# Altium PCB Tony_Tablet.PcbDoc (part 1 of 5)
Units mm, origin at the board's own origin, x right, y up, seen from the top; angles counter-clockwise.
Board outline 136.83 x 90.55 mm, 4 copper layers (Top Layer, Power, GND, Bottom Layer), stack 0.778 mm thick; 275 components, 264 nets, 1226 pads, 0 vias.
Unrouted connection lines stored in the file: 716.
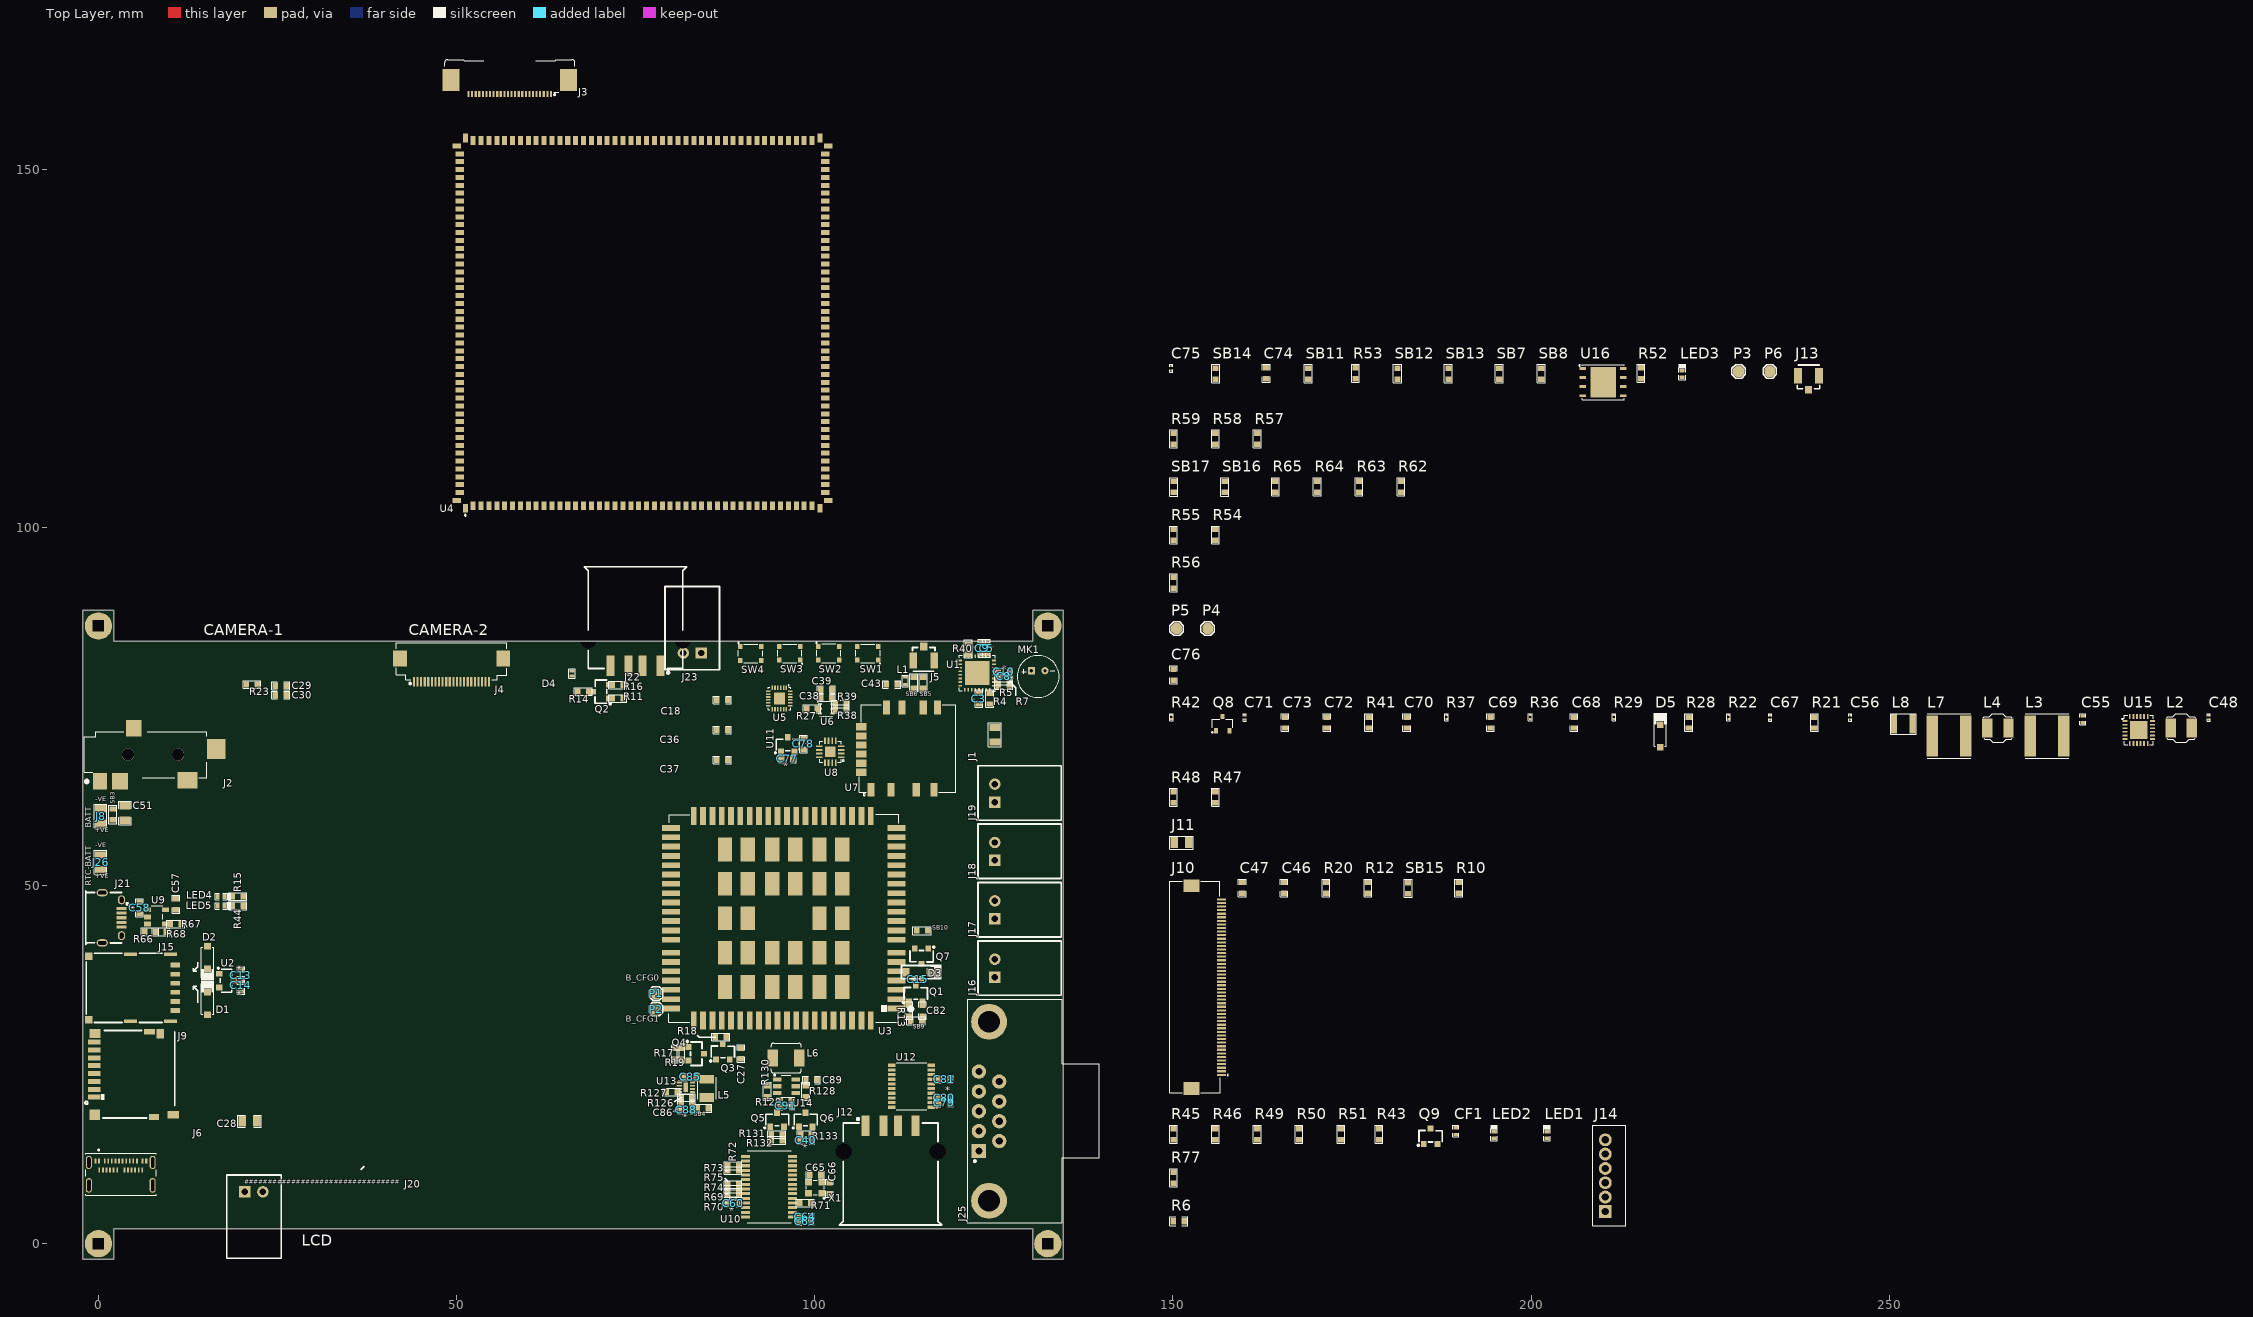
[diagram p0: Top Layer view]
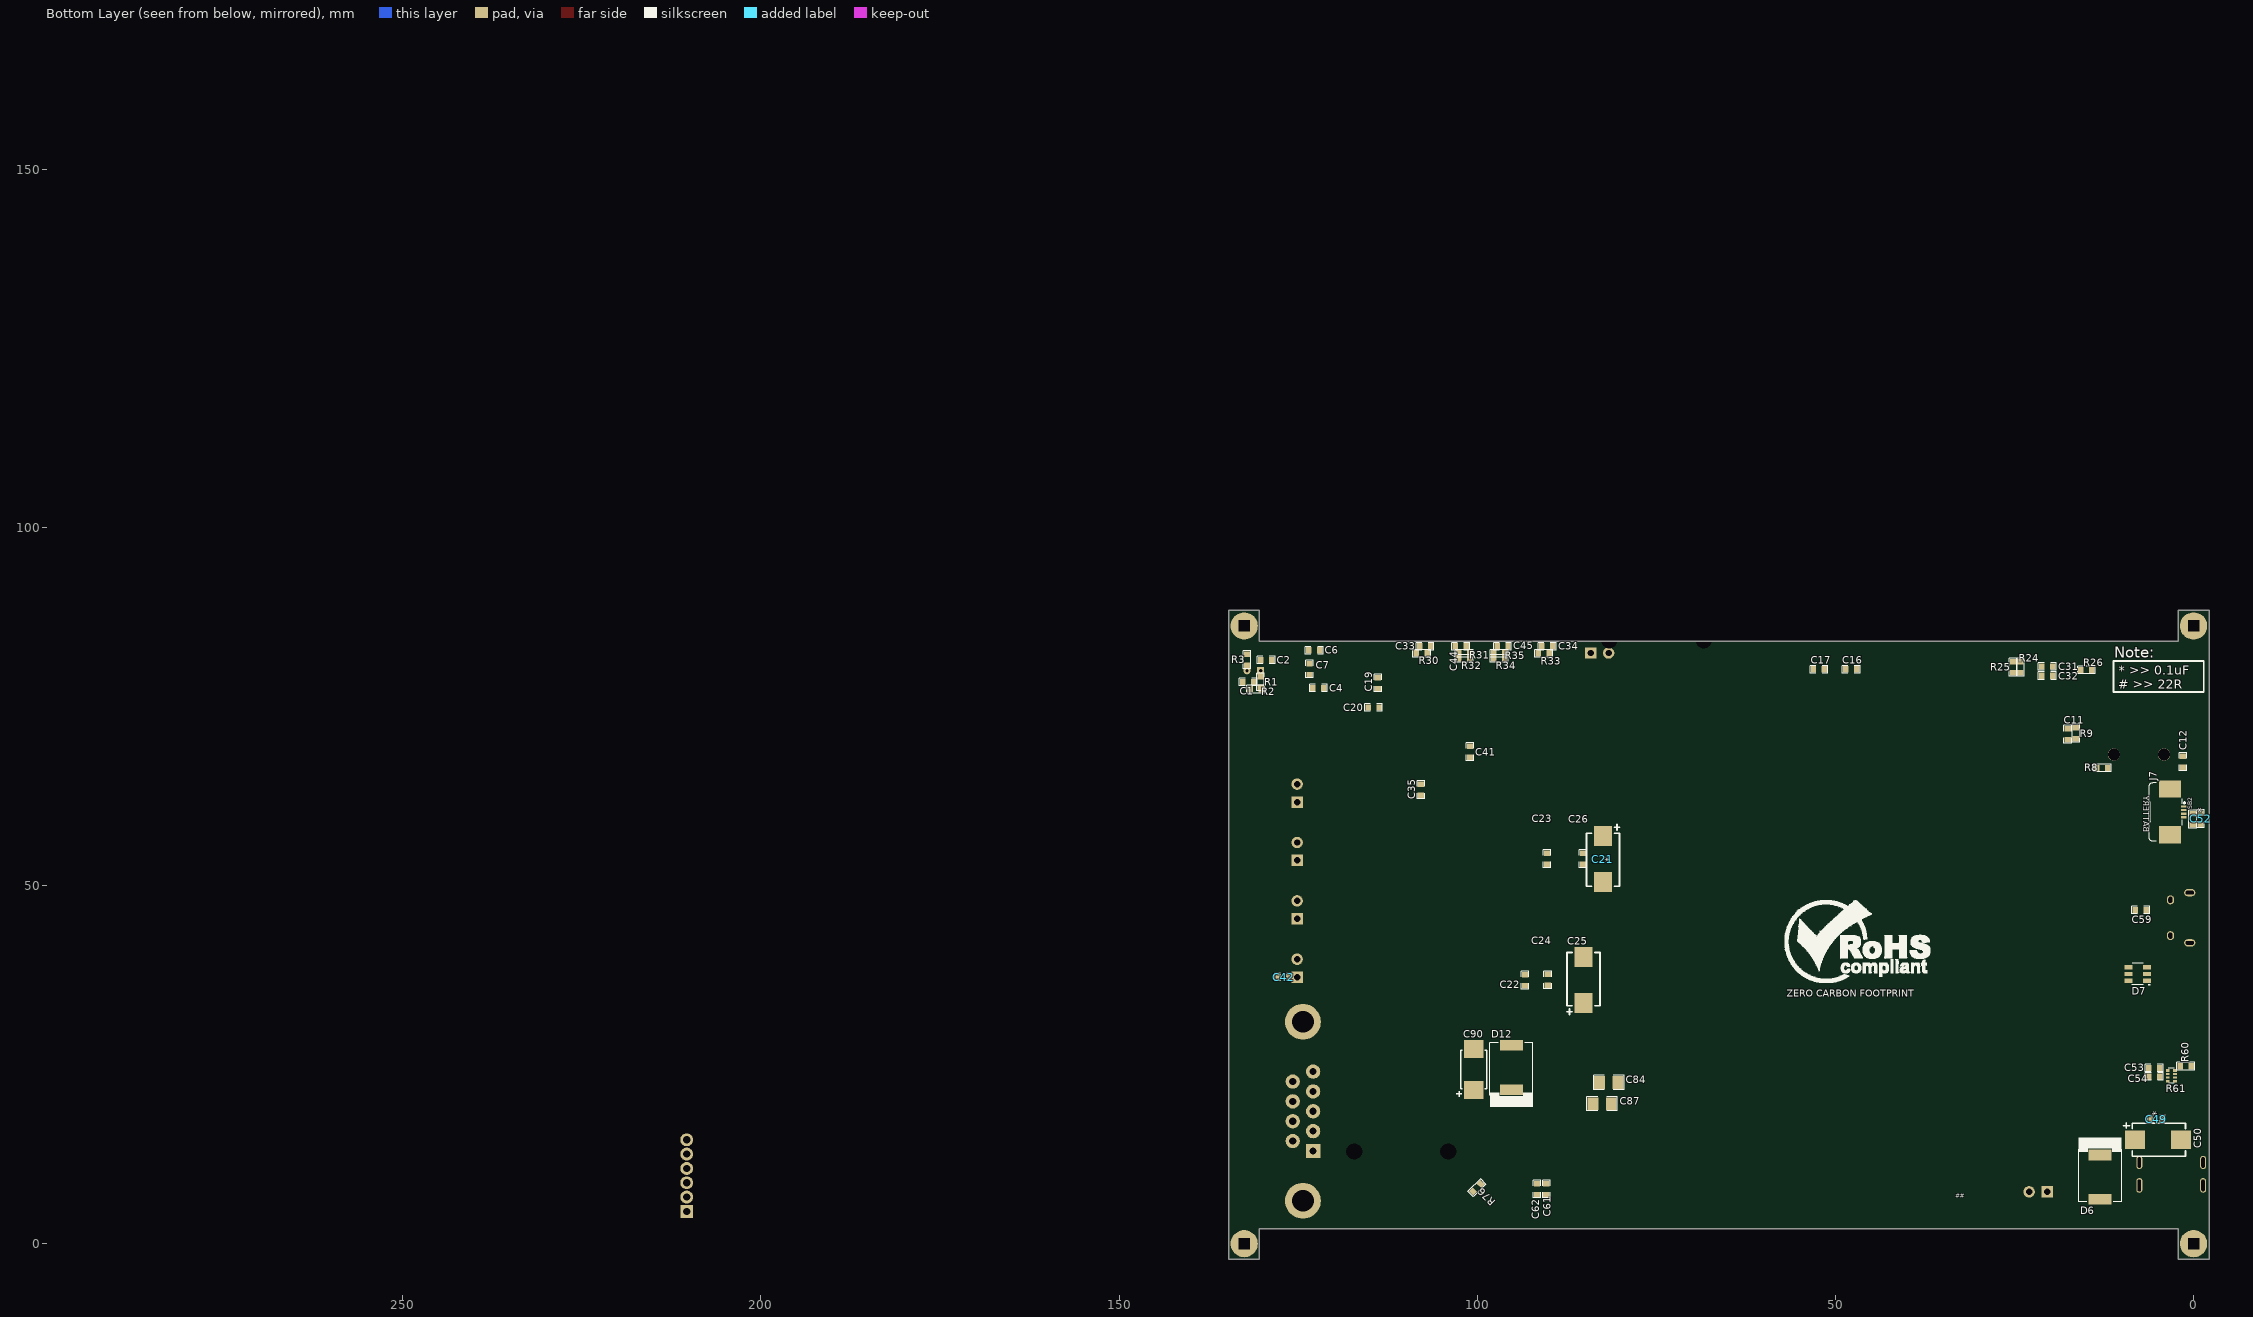
[diagram p1: Bottom Layer view, seen from below]
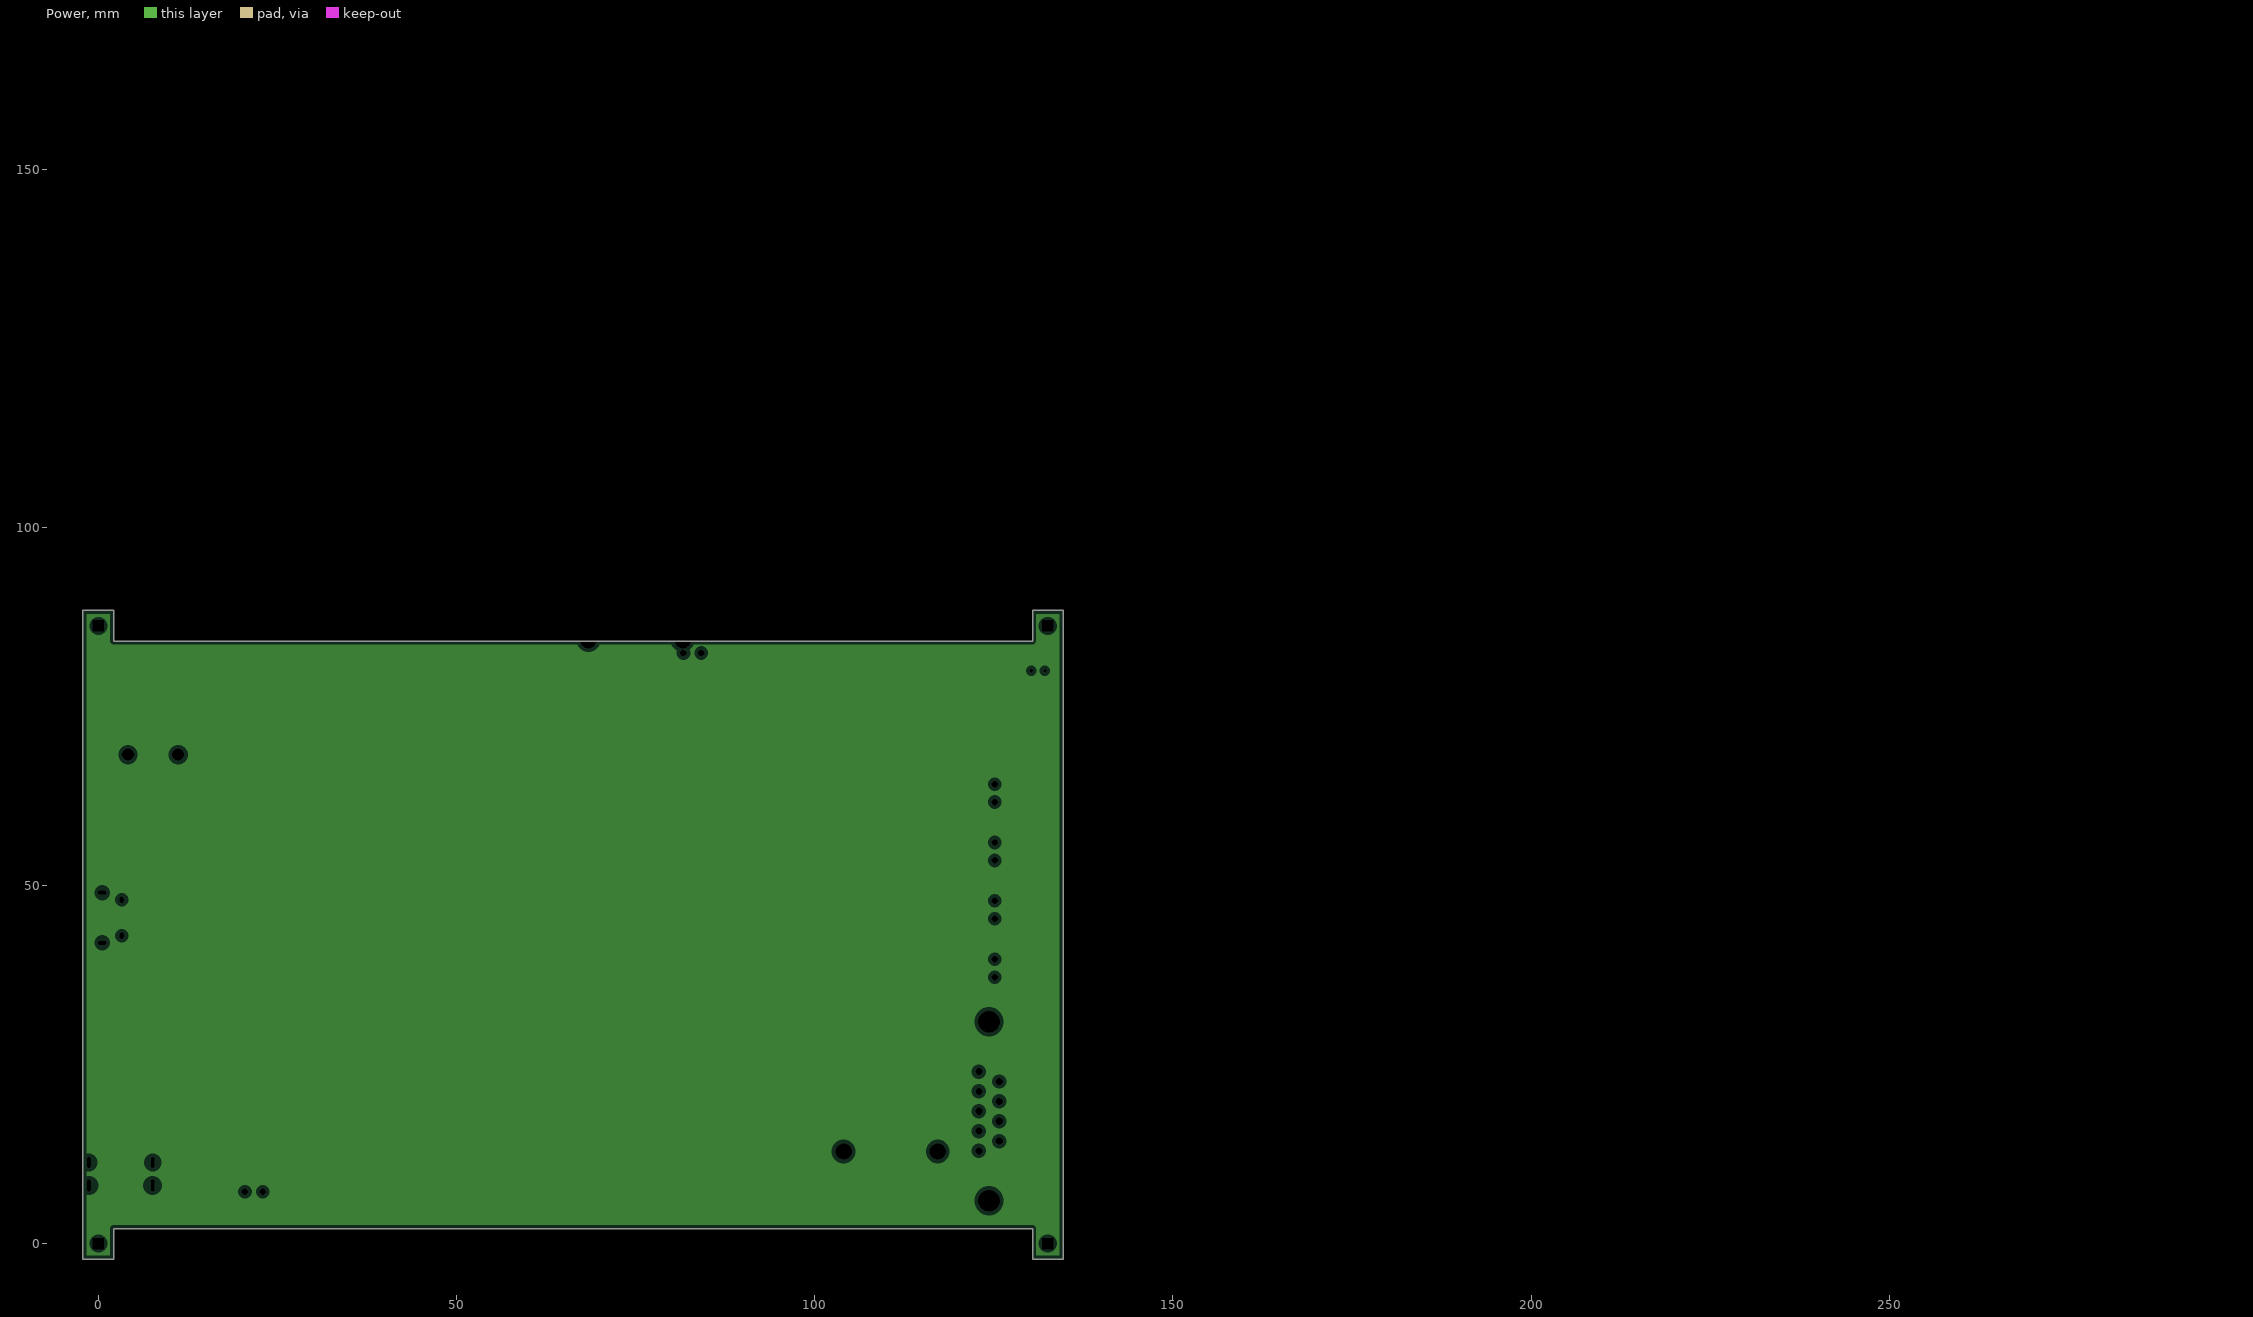
[diagram p2: Power, clearances drawn from the general rule]
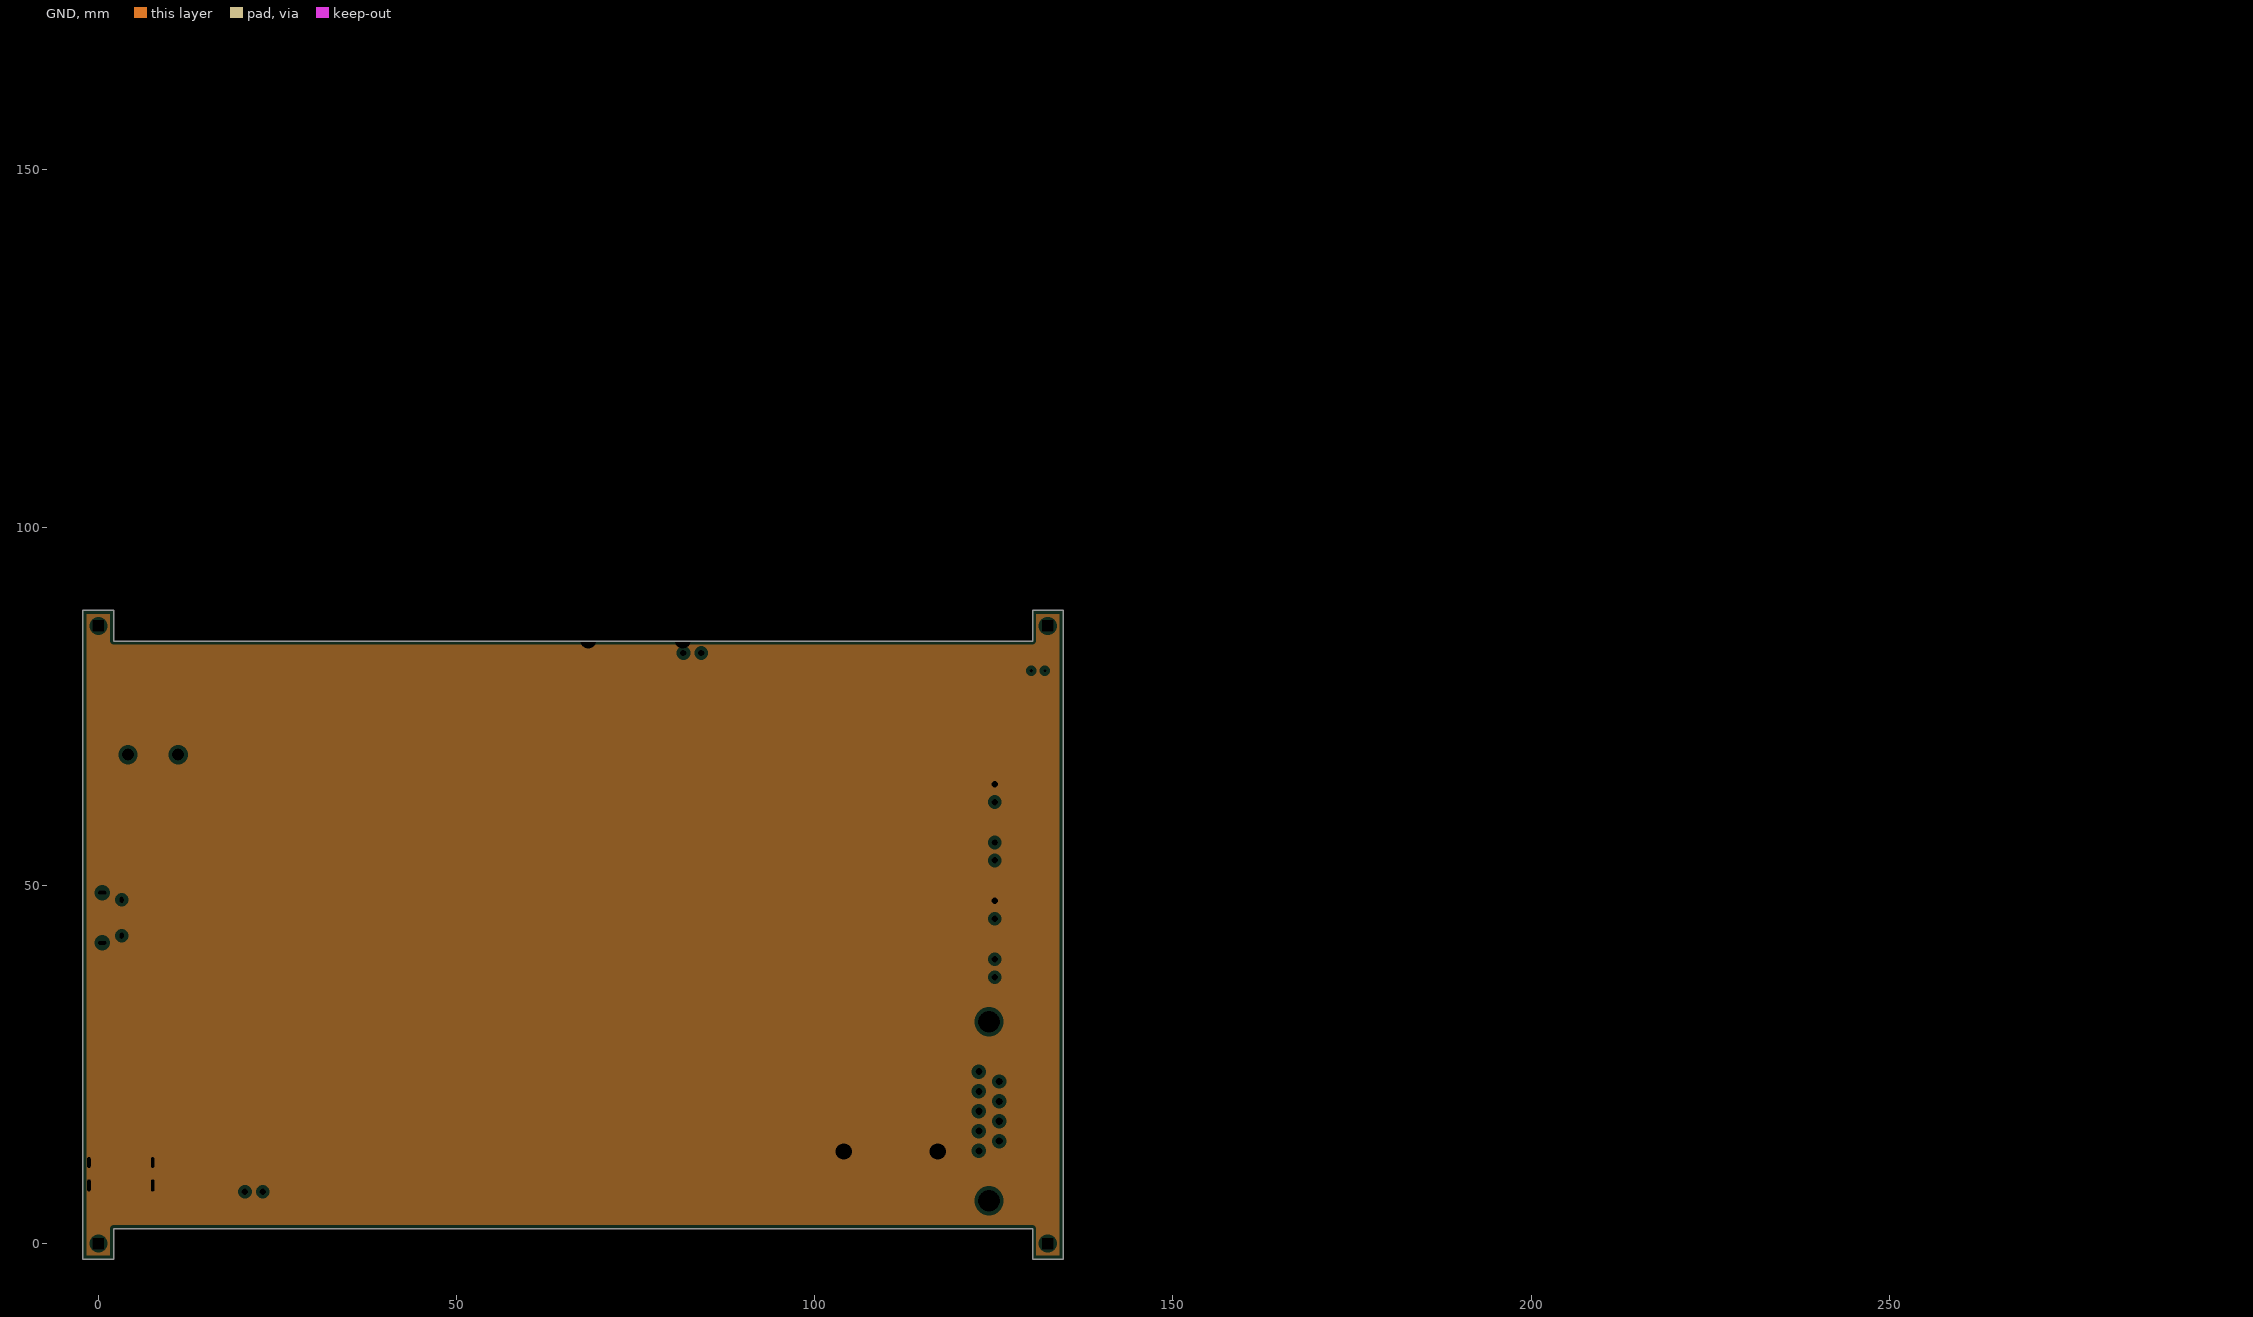
[diagram p3: GND, clearances drawn from the general rule]

## Layer stack, top to bottom
Top Solder: solder mask 0.0102, Solder Resist, Dk 3.5
Top Layer: signal copper 0.0356
Dielectric 1: core 0.254, FR-4, Dk 4.2
Power: plane copper 0.036
Dielectric 2: prepreg 0.127, Dk 4.2
GND: plane copper 0.036, net GND
Dielectric 3: core 0.254, Dk 4.2
Bottom Layer: signal copper 0.0356
Bottom Solder: solder mask 0.0102, Solder Resist, Dk 3.5

## Board outline
-2.159,-2.159 -2.159,-2.134 -2.159,88.392 2.134,88.392 2.134,84.125 130.404,84.125 130.404,88.392 134.671,88.392 134.671,-2.159 130.404,-2.159 130.404,2.108 2.134,2.108 2.134,-2.159

## Design rules (kind name [scope] priority, off if disabled: settings)
Clearance [All] p1: gap=0.178 ignorepadtopadclearanceinfootprint=FALSE except(0.127: Arc-SMDPad Track-SMDPad SMDPad-SMDPad)
ComponentClearance [All] p1: gap=0 collisioncheckmode=3 verticalgap=0 showdistances=FALSE
Height [All] p1: minheight=0 maxheight=254 prefheight=12.7
HoleSize [All] p1: absolutevalues=TRUE maxlimit=25.4 minlimit=0.025 maxpercent=80.000 minpercent=20.000
HoleToHoleClearance [All] p1: gap=0.025 allowstackedmicrovias=TRUE
MinimumSolderMaskSliver [All] p1: minsoldermaskwidth=0.025
PlaneClearance [All] p1: clearance=0.508
PlaneConnect [All] p1: planeconnectstyle=Direct reliefexpansion=0.508 reliefentries=4 reliefconductorwidth=0.254 reliefairgap=0.254
PolygonConnect [All] p1: connectstyle=Relief reliefconductorwidth=0.254 reliefentries=4 polygonreliefangle="90 Angle" airgapwidth=0.254
RoutingVias [All] p1: holewidth=0.711 width=1.27 viastyle="Through Hole" minholewidth=0.711 minwidth=1.27 maxholewidth=0.711 maxwidth=1.27
SilkToSilkClearance [All] p1: silktosilkclearance=0.025
SilkToSolderMaskClearance [IsPad] p1: minsilkscreentomaskgap=0.025 clearancetoexposedcopper=TRUE
SolderMaskExpansion SolderMaskExpansion_1 [IsVia] p1: expansion=0.102 soldermaskfromhole=TRUE
SolderMaskExpansion [Not IsVia] p2: expansion=0.102
Width [All] p1: maxlimit=2.54 minlimit=0.203 preferedwidth=0.305
21 further rules are at their usual default settings.

## Classes and differential pairs
component class U_LCD_Drive_Sec: C48 C55 C56 C67 C68 C69 C70 C71 C72 C73 D5 L2 L3 L4 L7 L8 Q8 R21 R22 R28 R29 R36 R37 R41 R42 U15
component class U_USIM_Sec: C14 C21 C22 C23 C24 C25 C26 C27 C74 C75 D3 D4 D7 J13 J15 J23 LED3 P1 P2 P3 P6 R44 R52 R53 SB7 SB8 SB9 SB10 SB11 SB12 SB13 SB14 U3 U16
component class U_USB_Power: C40 C89 C90 C91 D12 L6 Q5 Q6 R128 R129 R130 R131 R132 R133 U14
component class U_USB_OTG: C57 C58 C59 J21 R57 R58 R59 U9
component class U_USB_Host: C60 C61 C62 C63 C64 C65 C82 J12 J22 R60 R62 R63 R64 R65 R66 R67 R70 SB16 SB17 U10 X1
component class U_Sensor_Section: C18 C36 C37 C38 C39 R27 R38 R39 U5 U6
component class U_RTC_Sec: C13 C66 D1 D2 J26 U2
component class "U_RS-232 Tranceiver Section": C52 C78 C79 C80 C81 J16 J17 J18 J19 J25 R54 R55 U12
component class U_MIC_Sec: C1 C2 MK1 R1 R2 R3
component class U_Memory_Section: C53 C54 J9 R56 R61
component class U_MCU_Core_Power: C84 C85 C86 C87 C88 L5 R126 R127 SB4 U13
component class U_Main_Cont: C28 J20 LED4 P4 P5 R11 U4
component class U_Main_Cont_2: LED5 R77
component class U_Level_Shifter_Sec: C41 C76 U11
component class U_7''_LCD_Connector: C46 C47 J10 R10 R12 R20 R68 R69 R71 R72 R73 R74 R75 R76 SB15
component class U_Key_Buttons: C33 C34 C44 C45 R30 R31 R32 R33 R34 R35 SW1 SW2 SW3 SW4
component class U_Headphones_Sec: C11 C12 J2 R8 R9
component class U_Connector_Section: C42 C49 C50 C51 D6 J6 J7 J8 R47 R48 SB2 SB3
component class U_Camera_Section: C16 C17 C29 C30 C31 C32 J3 J4 R23 R26 R27
component class U_BLE&WiFi_Section: C19 C20 C35 C43 C77 J5 L1 SB5 SB6 U7 U8
component class U_Audio_Codec_Sec: C3 C4 C5 C6 C7 C8 C9 C10 J1 J11 R4 R5 R7 R40 U1
component class U_3G_Modem: C15 C82 CF1 J14 LED1 LED2 Q1 Q2 Q3 Q4 Q7 Q9 R11 R13 R14 R16 R17 R18 R19 R43 R45 R46 R49 R50 R51

## Components (designator, comment, footprint, x,y, rotation, side; value= is the part's Value field where it differs from the comment)
C1 "4.7uF" Cap0603 131.953,78.401 r0 bottom locked
C2 "1uF" Cap0603 129.464,81.458 r180 bottom locked
C3 "0.1uF" Cap0603 122.932,76.099 r270 top locked
C4 "10uF" Cap0603 122.174,77.546 r180 bottom locked
C5 "0.1uF" Cap0603 124.003,83.116 r90 top locked
C6 "10uF" Cap0603 122.758,82.829 r180 bottom locked
C7 "4.7uF" Cap0603 123.419,80.213 r270 bottom locked
C8 "0.1uF" Cap0603 126.39,79.223 r180 top locked
C9 "0.1uF" Cap0603 123.368,83.116 r90 top locked
C10 "0.1uF" Cap0603 126.39,79.832 r180 top locked
C11 "4.7uF" Cap0603 17.577,71.095 r270 bottom locked
C12 "4.7uF" Cap0603 1.499,67.285 r270 bottom locked
C13 "0.1uF" Cap0603 19.888,37.44 r90 top locked
C14 "0.1uF" Cap0603 19.888,36.093 r270 top locked
C15 "10nF" Cap0402 114.402,36.932 r0 top locked
C16 "1uF" Cap0603 47.803,80.162 r180 bottom locked
C17 "10uF" Cap0603 52.299,80.162 r0 bottom locked
C18 "0.1uF" Cap0603 87.097,75.895 r180 top locked
C19 "1.2pF" Cap0603 113.868,78.257 r270 bottom locked
C20 "1.2pF" Cap0603 114.478,74.854 r0 bottom locked
C21 "100uF" 593D107X9016D2TE3 82.448,53.696 r270 bottom locked
C22 "10pF" Cap0603 93.32,36.779 r90 bottom locked
C23 "33pF" Cap0603 90.248,53.746 r270 bottom locked
C24 "0.1uF" Cap0603 90.17,36.816 r90 bottom locked
C25 "100uF" 593D107X9016D2TE3 85.166,36.816 r90 bottom locked
C26 "10pF" Cap0603 85.234,53.746 r270 bottom locked
C27 "33pF" Cap0603 89.687,26.543 r270 top locked
C28 "22UF" Cap0805 21.107,17.094 r180 top locked
C29 "1uF" Cap0603 25.451,77.876 r0 top locked
C30 "10uF" Cap0603 25.451,76.581 r0 top locked
C31 "1uF" Cap0603 20.422,80.569 r180 bottom locked
C32 "10uF" Cap0603 20.422,79.273 r180 bottom locked
C33 "1uF" Cap0603 107.29,83.388 r0 bottom locked
C34 "1uF" Cap0603 90.246,83.388 r0 bottom locked
C35 "10uF" Cap0603 107.865,63.364 r90 bottom locked
C36 "0.1uF" Cap0603 87.097,71.717 r0 top locked
C37 "0.1uF" Cap0603 87.097,67.539 r0 top locked
C38 "0.1uF" Cap0603 101.613,76.302 r0 top locked
C39 "0.1uF" Cap0603 101.613,77.318 r0 top locked
C40 "0.1uF" Cap0603 98.776,14.427 r0 top locked
C41 "0.1uF" Cap0603 101.009,68.682 r90 bottom locked
C42 "0.1uF" Cap0603 127.051,37.206 r0 bottom locked
C43 "1uF" Cap0603 110.744,78.08 r180 top locked
C44 "1uF" Cap0603 102.32,83.388 r180 bottom locked
C45 "1uF" Cap0603 96.469,83.388 r0 bottom locked
C46 "0.1uF" Cap0603 165.532,49.657 r90 top
C47 "1uF" Cap0603 159.69,49.657 r90 top
C48 "0.1uF" "CAP 0201" 294.615,73.457 r90 top
C49 "0.1uF" Cap0603 5.182,17.399 r180 bottom locked
C50 "100uF" 593D107X9016D2TE3 4.953,14.503 r180 bottom locked
C51 "22UF" Cap0805 3.708,60.122 r270 top locked
C52 "0.1uF" Cap0603 -0.965,59.309 r270 bottom locked
C53 "10uF" Cap0603 5.512,24.511 r0 bottom locked
C54 "0.1uF" Cap0603 5.486,23.317 r0 bottom locked
C55 "2.2uF" Cap0402 277.012,73.203 r90 top
C56 "0.1uF" "CAP 0201" 244.577,73.457 r90 top
C57 "10uF" Cap0603 10.82,47.371 r90 top locked
C58 "0.1uF" Cap0603 5.74,46.888 r90 top locked
C59 "10uF" Cap0603 7.391,46.558 r0 bottom locked
C60 "0.1uF" Cap0603 88.595,5.675 r0 top locked
C61 "10uF" Cap0603 90.349,7.625 r90 bottom locked
C62 "10uF" Cap0603 91.669,7.625 r90 bottom locked
C63 "0.1uF" Cap0603 98.654,3.124 r0 top locked
C64 "0.1uF" Cap0603 98.654,3.734 r0 top locked
C65 "18pF" Cap0603 100.051,9.601 r180 top locked
C66 "0.1uF" Cap0603 102.057,7.747 r270 top locked
C67 "0.1uF" "CAP 0201" 233.401,73.457 r90 top
C68 "4.7pF" Cap0603 206.019,72.746 r90 top
C69 "4.7uF" Cap0603 194.335,72.746 r90 top
C70 "220nF" Cap0603 182.651,72.746 r90 top
C71 "0.1uF" "CAP 0201" 160.02,73.457 r90 top
C72 "4.7uF" Cap0603 171.501,72.746 r90 top
C73 "220nF" Cap0603 165.659,72.746 r90 top
C74 "1uF" Cap0603 163.043,121.488 r90 top
C75 "0.1uF" "CAP 0201" 149.784,122.199 r90 top
C76 "0.1uF" Cap0603 150.089,79.426 r90 top
C77 "10000pF" Cap0603 96.19,67.666 r0 top locked
C78 "0.1uF" Cap0603 98.425,69.753 r270 top locked
C79 "0.1uF" Cap0603 118.085,19.66 r180 top locked
C80 "0.1uF" Cap0603 118.085,20.345 r0 top locked
C81 "0.1uF" Cap0603 118.085,22.936 r0 top locked
C82 "18pF" Cap0603 115.047,32.537 r90 top locked
C84 "47uF" Cap1206 81.64,22.488 r180 bottom locked
C85 "0.1uF" Cap0603 82.631,23.275 r180 top locked
C86 "22pF" Cap0603 82.098,19.529 r180 top locked
C87 "47uF" Cap1206 82.568,19.529 r180 bottom locked
C88 "0.1uF" Cap0603 82.098,18.678 r180 top locked
C89 "10uF" Cap0603 99.543,22.86 r0 top locked
C90 "22uF" T491C226K025AT 100.508,24.308 r90 bottom locked
C91 "0.1uF" Cap0603 95.987,19.228 r180 top locked
CF1 "10nF" Cap0402 189.484,15.723 r90 top
D1 "1N4148W-7-F" SOD-123 15.24,33.503 r90 top locked
D2 "1N4148W-7-F" SOD-123 15.24,39.929 r270 top locked
D3 "BZD27C5V1P_R1_00001" BZD27C5V1P_R1_00001 114.443,37.897 r0 top locked value=Custom
D4 "ESD9B3.3ST5G-N" ESD9B3.3ST5G-N 66.116,79.578 r90 top locked value=3.3V
D5 "SD103BW-7-F" SOD-123 218.034,70.891 r90 top
D6 "SS34-E3/57T" SMC 13.056,9.296 r270 bottom locked
D7 "ESDA6V1-5SC6" SOT-23-6 7.799,37.643 r0 bottom locked
D12 "SS34-E3/57T" SMC 95.25,24.587 r90 bottom locked
J1 "SMD PADS" "SMD PAD" 125.146,71.049 r90 top locked
J2 "SJ-43515TS-SMT-TR" SJ-43515TS-SMT-TR 8.331,68.275 r0 top locked
J3 "0524352471" 0524352471 57.421,161.465 r180 top
J4 "TF31-22S-0.5SH(800)" TF31-22S-0.5SH(800) 49.301,80.078 r0 top locked
J5 "U.FL-R-SMT-1(80)" U.FL-R-SMT-1(80) 115.214,82.432 r180 top locked
J6 "2305018-2" 2305018-2 3.124,9.83 r0 top locked
J7 "0527460471" 0527460471 2.337,60.274 r270 bottom locked
J8 "SMD PADS" "SMD PAD" 0.305,59.69 r90 top locked
J9 "114-00841-68" 114-00841-68 4.928,23.622 r270 top locked
J10 "FH12A-50S-0.5SH(55)" FH12A-50S-0.5SH(55) 154.686,35.814 r90 top
J11 "SMD PADS" "SMD PAD" 151.206,55.982 r0 top
J12 "87583-2010BLF" 87583-2010BLF 110.592,14.656 r0 top locked
J13 "U.FL-R-SMT-1(80)" U.FL-R-SMT-1(80) 238.735,120.142 r0 top
J14 "B6B-PH-K-S(LF)(SN)" B6B-PH-K-S(LF)(SN) 210.363,9.5 r90 top
J15 "693043020611" 693043020611 4.65,35.712 r270 top locked
J16 "S2B-XH-A(LF)(SN)" S2B-XH-A(LF)(SN) 125.146,38.456 r90 top locked
J17 "S2B-XH-A(LF)(SN)" S2B-XH-A(LF)(SN) 125.146,46.604 r90 top locked
J18 "S2B-XH-A(LF)(SN)" S2B-XH-A(LF)(SN) 125.146,54.752 r90 top locked
J19 "S2B-XH-A(LF)(SN)" S2B-XH-A(LF)(SN) 125.146,62.901 r90 top locked
J20 "S2B-XH-A(LF)(SN)" S2B-XH-A(LF)(SN) 21.707,7.239 r0 top locked
J21 "10118194-0001LF" 10118194-0001LF 3.233,45.497 r270 top locked
J22 "87583-2010BLF" 87583-2010BLF 74.981,82.457 r180 top locked
J23 "S2B-XH-A(LF)(SN)" S2B-XH-A(LF)(SN) 82.919,82.457 r180 top locked
J25 "A-DF 09 A/KG-T4S" "A-DF 09 A/KG-T4S" 124.335,18.479 r90 top locked
J26 "SMD PADS" "SMD PAD" 0.305,53.238 r90 top locked
L1 "2.2nH" "IND 0402" 112.649,78.562 r270 top locked
L2 "47uH" LQH44PN470MJ0L 290.754,71.984 r0 top
L3 "22uH" NRS6045T220MMGK 272.009,70.866 r0 top
L4 "47uH" LQH44PN470MJ0L 265.176,71.984 r0 top
L5 "1uH" LQH32PN1R0NNCL 84.942,21.675 r270 top locked
L6 "2.2uH" 74437324022 95.987,25.908 r0 top locked
L7 "22uH" NRS6045T220MMGK 258.343,70.866 r0 top
L8 "33uH" CBC3225T330KR 251.968,72.568 r0 top
LED1 "LED Blue" "LED 0402" 202.209,15.189 r90 top
LED2 "LED Blue" "LED 0402" 194.843,15.189 r90 top
LED3 "LED Blue" "LED 0402" 221.107,121.412 r90 top
LED4 "LED Blue" "LED 0402" 17.12,48.463 r0 top locked
LED5 "LED Blue" "LED 0402" 17.12,47.168 r0 top locked
MK1 "POM-2738P-R" POM-2738P-R 131.191,79.985 r0 top locked
P1 "Test Point" "TEST POINT" 77.851,34.925 r0 top locked
P2 "Test Point" "TEST POINT" 77.851,32.741 r0 top locked
P3 "Test Point" "TEST POINT" 228.981,121.768 r0 top
P4 "Test Point" "TEST POINT" 154.864,85.852 r0 top
P5 "Test Point" "TEST POINT" 150.52,85.852 r0 top
P6 "Test Point" "TEST POINT" 233.324,121.768 r0 top
Q1 "BSS138LT1G" SOT23-3 114.097,34.928 r0 top locked
Q2 "BSS138LT1G" SOT23-3 70.155,77.064 r90 top locked
Q3 "BSS138LT1G" SOT23-3 87.173,26.772 r0 top locked
Q4 "BSS138LT1G" SOT23-3 83.464,26.518 r270 top locked
Q5 "MMBT3904" SOT-23 94.742,17.31 r0 top locked
Q6 "CJ2305" SOT-23 98.73,17.297 r0 top locked value=Custom
Q7 "BSS138LT1G" SOT23-3 114.91,40.132 r180 top locked
Q8 "SI2301BDS-T1-E3" SI2301BDS-T1-E3 156.947,72.593 r0 top
Q9 "BSS138LT1G" SOT23-3 185.979,14.986 r0 top
R1 "680R" Res0603#1 130.241,78.41 r270 bottom locked
R2 "5.6K" Res0603#1 130.912,77.394 r0 bottom locked
R3 "680R" Res0603#1 132.141,81.534 r90 bottom locked
R4 "100R" Res0603#1 124.432,76.098 r90 top locked
R5 "100R" Res0603#1 126.39,77.904 r180 top locked
R6 "33R" Res0603#2 150.825,3.124 r0 top
R7 "10K" Res0603#1 126.39,78.588 r180 top locked
R8 "10K" Res0603#1 12.725,66.4 r0 bottom locked
R9 "10K" Res0603#1 16.431,71.247 r90 bottom locked
R10 "10K" Res0603#1 189.916,49.657 r90 top
R11 "2.2K" Res0603#1 72.517,76.124 r0 top locked
R12 "10K" Res0603#1 177.216,49.657 r90 top
R13 "4.7K" Res0603#1 113.157,32.537 r270 top locked
R14 "47K" Res0603#1 67.666,77.064 r180 top locked
R15 "2.2K" Res0603#1 19.431,48.463 r180 top locked
R16 "4.7K" Res0603#1 72.517,78.014 r180 top locked
R17 "4.7K" Res0603#1 80.543,26.518 r270 top locked
R18 "4.7K" Res0603#1 86.893,28.829 r0 top locked
R19 "4.7K" Res0603#1 81.331,26.518 r270 top locked
R20 "10K" Res0603#1 171.374,49.657 r90 top
R21 "11K8" Res0603#1 239.547,72.746 r90 top
R22 "47K" Res-0201 227.584,73.508 r90 top
R23 "470R" Res0603#1 21.438,78.054 r180 top locked
R24 "0R" Res0603#1 24.181,80.467 r90 bottom locked
R25 "100R" Res0603#1 25.171,80.467 r90 bottom locked
R26 "100R" Res0603#1 14.961,80.086 r180 bottom locked
R27 "33R" Res0603#1 99.619,74.676 r180 top locked
R28 "7.32K" Res0603#1 222.021,72.746 r90 top
R29 "1K" Res-0201 211.582,73.508 r90 top
R30 "100R" Res0603#1 107.772,82.41 r180 bottom locked
R31 "10K" Res0603#1 101.829,82.41 r0 bottom locked
R32 "100R" Res0603#1 101.829,81.686 r0 bottom locked
R33 "10K" Res0603#1 90.729,82.41 r0 bottom locked
R34 "100R" Res0603#1 96.952,81.686 r180 bottom locked
R35 "100R" Res0603#1 96.952,82.41 r180 bottom locked
R36 "1K" Res-0201 199.898,73.508 r90 top
R37 "1K" Res-0201 188.214,73.508 r90 top
R38 "2.2K" Res0603#1 103.607,74.676 r0 top locked
R39 "10K" Res0603#1 103.607,75.326 r0 top locked
R40 "2.2K" Res0603#1 121.432,83.058 r90 top locked
R41 "4R99" Res0603#1 177.343,72.746 r90 top
R42 "1M" Res-0201 149.809,73.508 r90 top
R43 "4.7K" Res0603#1 178.791,15.265 r90 top
R44 "2.2K" Res0603#1 19.431,47.168 r180 top locked
R45 "47K" Res0603#1 150.089,15.265 r90 top
R46 "47K" Res0603#1 155.931,15.265 r90 top
R47 "5.1K" Res0603#1 155.931,62.306 r90 top
R48 "5.1K" Res0603#1 150.089,62.306 r90 top
R49 "47K" Res0603#1 161.773,15.265 r90 top
R50 "47K" Res0603#1 167.615,15.265 r90 top
R51 "47K" Res0603#1 173.457,15.265 r90 top
R52 "4.7K" Res0603#1 215.341,121.488 r90 top
R53 "20K" Res0603#1 175.489,121.488 r90 top
R54 "100R" Res0603#1 155.931,98.933 r90 top
R55 "100R" Res0603#1 150.089,98.933 r90 top
R56 "100R" Res0603#1 150.089,92.253 r90 top
R57 "6.8K" Res0603#1 161.773,112.344 r90 top
R58 "1K" Res0603#1 155.931,112.344 r90 top
R59 "100K" Res0603#1 150.089,112.344 r90 top
R60 "10K" Res0603#1 1.092,24.765 r180 bottom locked
R61 "47K" CAY10-473J4LF 3.591,24.181 r180 bottom locked
R62 "680R" Res0603#1 181.839,105.664 r90 top
R63 "510K" Res0603#1 175.997,105.664 r90 top
R64 "100K" Res0603#1 170.155,105.664 r90 top
R65 "1.1M" Res0603#1 164.313,105.664 r90 top
R66 "10K" Res0603#1 7.214,43.536 r0 top locked
R67 "20K" Res0603#1 10.795,44.618 r0 top locked
R68 "10K" Res0603#1 8.738,43.536 r180 top locked
R69 "10K" Res0603#1 88.595,6.979 r180 top locked
R70 "47K" Res-0201 88.595,6.325 r180 top locked
R71 "10K" Res0603#1 98.654,5.675 r180 top locked
R72 "10K" Res0603#1 88.595,10.871 r180 top locked
R73 "10K" Res0603#1 88.595,10.211 r180 top locked
R74 "10K" Res0603#1 88.595,7.633 r180 top locked
R75 "100K" Res0603#1 88.595,8.28 r180 top locked
R76 "10K" Res0603#1 100.051,7.798 r135 bottom locked
R77 "470R" Res0603#1 150.089,9.195 r90 top
R126 "402K" Res0603#1 82.098,20.405 r0 top locked
R127 "270K" Res0603#1 80.015,21.167 r180 top locked
R128 "100K" Res0603#1 98.755,21.285 r90 top locked
R129 "536K" Res0603#1 95.961,19.914 r180 top locked
R130 "100K" Res0603#1 93.37,21.285 r270 top locked
R131 "10K" Res0603#1 94.717,15.215 r0 top locked
R132 "5.1K" Res0603#1 94.717,14.427 r0 top locked
R133 "100K" Res0603#1 98.781,15.215 r0 top locked
SB2 "Solder Bridge" "Solder Bridge" 0.102,59.258 r270 bottom locked
SB3 "Solder Bridge" "Solder Bridge" 2.007,59.919 r270 top locked
SB4 "Solder Bridge" "Solder Bridge" 84.384,18.906 r180 top locked
SB5 "Solder Bridge" "Solder Bridge" 115.164,78.283 r270 top locked
SB6 "Solder Bridge" "Solder Bridge" 113.843,78.283 r90 top locked
SB7 "Solder Bridge" "Solder Bridge" 195.58,121.463 r90 top
SB8 "Solder Bridge" "Solder Bridge" 201.422,121.463 r90 top
SB9 "Solder Bridge" "Solder Bridge" 114.148,31.14 r180 top locked
SB10 "Solder Bridge" "Solder Bridge" 114.986,43.713 r0 top locked
SB11 "Solder Bridge" "Solder Bridge" 168.91,121.463 r90 top
SB12 "Solder Bridge" "Solder Bridge" 181.356,121.463 r90 top
SB13 "Solder Bridge" "Solder Bridge" 188.468,121.463 r90 top
SB14 "Solder Bridge" "Solder Bridge" 155.956,121.463 r90 top
SB15 "Solder Bridge" "Solder Bridge" 182.829,49.632 r90 top
SB16 "Solder Bridge" "Solder Bridge" 157.226,105.639 r90 top
SB17 "Solder Bridge" "Solder Bridge" 150.114,105.639 r90 top
SW1 "KMT021NGJLHS" KMT021NGJLHS 107.417,82.398 r180 top locked
SW2 "KMT021NGJLHS" KMT021NGJLHS 101.964,82.398 r0 top locked
SW3 "KMT021NGJLHS" KMT021NGJLHS 96.512,82.398 r180 top locked
SW4 "KMT021NGJLHS" KMT021NGJLHS 91.059,82.385 r0 top locked
U1 "ALC5621" 32-QFN 122.682,79.654 r0 top locked value=Custom
U2 "S-1206B18-M3T1U" SOT-23 17.882,36.728 r270 top locked
U3 "UC200T" UC200T 95.664,45.428 r180 top locked value=Custom
U4 "S5P4418" S5P4418 75.971,128.499 r90 top value=Custom
U5 "ICM-20948" "24-QFN (3x3)" 95.051,76.114 r270 top
U6 "VEML6030-GS15" 6-SMD 101.625,74.676 r0 top locked
U7 "F23BUUM13-W2" F23BUUM13-W2 117.145,74.854 r270 top locked
U8 "PCA9534BS3,118" 16HVQFN 102.178,68.671 r180 top locked
U9 "SY6280AAC" SOT23-5 8.103,45.618 r0 top locked value=Custom
U10 "GL850G" SSOP-28 93.624,7.95 r180 top locked
U11 "S-1206B18-M3T1U" SOT-23 96.241,69.672 r0 top locked
U12 "SP3222EEY-L/TR" 20-TSSOP 113.513,21.971 r180 top locked
U13 "ETA3451D2I-T" QFN-8 82.011,21.831 r0 top locked value=Custom
U14 "MP3221GJ-Z" TSOT-23-6 96.063,21.971 r0 top locked
U15 "LT1942EUF#PBF" LT1942EUF#PBF 284.836,71.704 r0 top
U16 "ST4SI2M0020TPIFW" ST4SI2M0020TPIFW 210.083,120.269 r0 top
X1 "8Z-12.000MAAJ-T" 8Z-12.000MAAJ-T 100.076,7.823 r180 top locked

## Footprints (in the part's own frame and the unit in brackets; to place one, negate y for a bottom-side part, rotate by r counter-clockwise, add the part's x,y. Pads: shape width x height; smd on the part's side, far side on the other; paste and mask are expansions set on the pad)
6-SMD [mm]
  rect 0.55x0.3 smd: 1(-0.875,0.65) 2(-0.875,0) 3(-0.875,-0.65) 4(0.875,-0.65) 5(0.875,0) 6(0.875,0.65)
  silkscreen extent -1.23,-1.04 0.91,1.04, body extent -1,-1 1,1, height 0.83
8Z-12.000MAAJ-T [mm]
  rect 1x0.9 smd: 1(-0.925,0.775) 2(0.925,0.775) 3(0.925,-0.775) 4(-0.925,-0.775)
  silkscreen extent -1.29,-1 1.25,1.57
16HVQFN [mm] "IC I/O EXPANDER I2C 8B 16HVQFN"
  rect 0.9x0.24 smd: 1(-1.55,0.75) 2(-1.55,0.25) 3(-1.55,-0.25) 4(-1.55,-0.75) 9(1.55,-0.75) 10(1.55,-0.25) 11(1.55,0.25) 12(1.55,0.75)
  rect 0.24x0.9 smd: 5(-0.75,-1.55) 6(-0.25,-1.55) 7(0.25,-1.55) 8(0.75,-1.55) 13(0.75,1.55) 14(0.25,1.55) 15(-0.25,1.55) 16(-0.75,1.55)
  rect 1.5x1.5 smd: 17(0,0)
  silkscreen extent -1.93,-1.5 1.5,1.5, body extent -1.5,-1.5 1.5,1.5, height 0.9
20-TSSOP [mm]
  rect 1.05x0.45 smd: 1(-2.775,2.925) 2(-2.775,2.275) 3(-2.775,1.625) 4(-2.775,0.975) 5(-2.775,0.325) 6(-2.775,-0.325) 7(-2.775,-0.975) 8(-2.775,-1.625) 9(-2.775,-2.275) 10(-2.775,-2.925) 11(2.775,-2.925) 12(2.775,-2.275) 13(2.775,-1.625) 14(2.775,-0.975) 15(2.775,-0.325) 16(2.775,0.325) 17(2.775,0.975) 18(2.775,1.625) 19(2.775,2.275) 20(2.775,2.925)
  silkscreen extent -3.61,-3.3 2.16,3.3, body extent -3.2,-3.25 3.2,3.25, height 1.2
"24-QFN (3x3)" [mm]
  rect 0.62x0.22 smd: 1(-1.52,1) 2(-1.52,0.6) 3(-1.52,0.2) 4(-1.52,-0.2) 5(-1.52,-0.6) 6(-1.52,-1) 13(1.52,-1) 14(1.52,-0.6) 15(1.52,-0.2) 16(1.52,0.2) 17(1.52,0.6) 18(1.52,1)
  rect 0.22x0.62 smd: 7(-1,-1.52) 8(-0.6,-1.52) 9(-0.2,-1.52) 10(0.2,-1.52) 11(0.6,-1.52) 12(1,-1.52) 19(1,1.52) 20(0.6,1.52) 21(0.2,1.52) 22(-0.2,1.52) 23(-0.6,1.52) 24(-1,1.52)
  rect 1.7x1.54 smd: 25(0,0)
  silkscreen extent -1.9,-1.57 1.57,1.57, body extent -1.5,-1.5 1.5,1.5, height 1.03
32-QFN [mm] "Audio codec"
  rect 0.5x0.23 smd: 1(-2.35,1.75) 2(-2.35,1.25) 3(-2.35,0.75) 4(-2.35,0.25) 5(-2.35,-0.25) 6(-2.35,-0.75) 7(-2.35,-1.25) 8(-2.35,-1.75) 17(2.35,-1.75) 18(2.35,-1.25) 19(2.35,-0.75) 20(2.35,-0.25) 21(2.35,0.25) 22(2.35,0.75) 23(2.35,1.25) 24(2.35,1.75)
  rect 0.23x0.5 smd: 9(-1.75,-2.35) 10(-1.25,-2.35) 11(-0.75,-2.35) 12(-0.25,-2.35) 13(0.25,-2.35) 14(0.75,-2.35) 15(1.25,-2.35) 16(1.75,-2.35) 25(1.75,2.35) 26(1.25,2.35) 27(0.75,2.35) 28(0.25,2.35) 29(-0.25,2.35) 30(-0.75,2.35) 31(-1.25,2.35) 32(-1.75,2.35)
  rect 3.4x3.4 smd: 33(0,0)
  silkscreen extent -2.88,-2.51 2.54,2.51, body extent -2.5,-2.5 2.5,2.5, height 0.9
114-00841-68 [mm]
  rect 0.7x1.75 smd: 1(3.174,-5.526) 2(2.074,-5.526) 3(0.974,-5.526) 4(-0.126,-5.526) 5(-1.226,-5.526) 6(-2.326,-5.526) 7(-3.426,-5.526) 8(-4.526,-5.526)
  rect 1x1.55 smd: "#CD Switch"(5.624,5.526)
  rect 1.3x1 smd: "*CD Switch"(-5.7,3.694)
  rect 1.5x1.5 smd: MP1(5.624,-5.424)
  rect 0.8x1.4 smd: MP2(5.954,2.826)
  rect 0.8x1.5 smd: MP3(-5.954,2.196)
  rect 1.3x1.5 smd: MP4(-5.726,-5.399)
  silkscreen extent -6.11,-6.8 6.08,5.72, body extent -6.05,-5.92 5.97,5.58, height 1.47
593D107X9016D2TE3 [mm]
  rect 2.79x2.57 smd: 1(-3.22,0) 2(3.22,0)
  silkscreen extent -4.85,-2.31 3.81,2.34, body extent -3.49,-2.21 3.7,2.21, height 2.88
87583-2010BLF [mm]
  rect 1.12x2.88 smd: 1(-3.5,1.79) 2(-1,1.79) 3(1,1.79) 4(3.5,1.79)
  rect 0x0 hole 2.3 unplated: MH1(-6.57,-1.79) MH2(6.57,-1.79)
  silkscreen extent -7.14,-12.04 7.14,2.92, body extent -7.2,-12.07 7.3,2.81, height 7.74
2305018-2 [mm] "CONN RCP USB3.1 TYPEC 24P SMD RA"
  rect 0.25x0.75 smd: A1(-3.05,1.7) A2(-2.25,1.7) A3(-1.75,1.7) A4(-1.25,1.7) A5(-0.75,1.7) A6(-0.25,1.7) A7(0.25,1.7) A8(0.75,1.7) A9(1.25,1.7) A10(1.75,1.7) A11(2.25,1.7) A12(3.05,1.7) B1(3,0.45) B2(2.5,0.45) B3(2,0.45) B4(1.5,0.45) B5(1,0.45) B6(0.5,0.45) B7(-0.5,0.45) B8(-1,0.45) B9(-1.5,0.45) B10(-2,0.45) B11(-2.5,0.45) B12(-3,0.45)
  rect 0.3x0.75 smd: G1(-3.55,1.7) G2(3.55,1.7)
  oval 0.85x2.05 hole 0.45 slot 1.65 at 90 deg: S1(-4.45,-1.7) S2(4.45,-1.7)
  oval 0.85x1.85 hole 0.45 slot 1.45 at 90 deg: S3(4.45,1.5) S4(-4.45,1.5)
  silkscreen extent -4.92,-3.07 4.92,3.33, body extent -4.92,-5.86 4.92,2.79, height 3.53
10118194-0001LF [mm]
  rect 0.42x1.35 smd: 1(-1.3,0) 2(-0.65,0) 3(0,0) 4(0.65,0) 5(1.3,0)
  oval 1.25x1 hole 0.55 slot 0.85 at 0 deg: MH1(-2.5,0) MH2(2.5,0)
  oval 1x1.55 hole 0.5 slot 1.15 at 90 deg: MH3(-3.5,-2.7) MH4(3.5,-2.7)
  silkscreen extent -3.73,-5 3.72,0.98, body extent -7.67,-5.38 4.02,0.2, height 2.72
0524352471 [mm]
  rect 0.3x0.8 smd: 1(-5.75,0.963) 2(-5.25,0.963) 3(-4.75,0.963) 4(-4.25,0.963) 5(-3.75,0.963) 6(-3.25,0.963) 7(-2.75,0.963) 8(-2.25,0.963) 9(-1.75,0.963) 10(-1.25,0.963) 11(-0.75,0.963) 12(-0.25,0.963) 13(0.25,0.963) 14(0.75,0.963) 15(1.25,0.963) 16(1.75,0.963) 17(2.25,0.963) 18(2.75,0.963) 19(3.25,0.963) 20(3.75,0.963) 21(4.25,0.963) 22(4.75,0.963) 23(5.25,0.963) 24(5.75,0.963)
  rect 2.4x3.05 smd: MP1(-8.2,-0.962) MP2(8.2,-0.962)
  silkscreen extent -9.09,-3.84 9.09,1.16, body extent -9.3,-3.94 9.3,1.26, height 2
0527460471 [mm]
  rect 0.3x0.8 smd: 1(-0.75,0.962) 2(-0.25,0.962) 3(0.25,0.962) 4(0.75,0.962)
  rect 2.4x3.05 smd: MP1(-3.2,-0.962) MP2(3.2,-0.962)
  silkscreen extent -4.09,-3.84 4.09,1.16, body extent -4.05,-3.81 4.05,1.19, height 2
74437324022 [mm]
  rect 1.5x2.4 smd: 1(-1.85,0) 2(1.85,0)
  silkscreen extent -2.08,-2.08 2.13,2.08, body extent -2.22,-2.03 2.22,2.03, height 1.7
693043020611 [mm] "CONN SMART CARD PUSH-PULL"
  rect 0.67x1.32 smd: C1(1.9,6.07) C2(-0.64,6.07) C3(-1.91,6.07) C5(3.17,6.07) C6(0.63,6.07) C7(-3.18,6.07)
  rect 1.05x1.02 smd: MP1(-4.416,-6.019) MP6(4.484,-6.019)
  rect 0.5x1.82 smd: MP2(-4.67,-0.17) MP3(-4.67,5.4) MP4(4.67,5.4) MP5(4.67,-0.17)
  silkscreen extent -4.83,-6.35 4.83,4.24, body extent -4.75,-6.25 4.75,6.25, height 1.2
"A-DF 09 A/KG-T4S" [mm]
  rect 2x2 hole 1: 1(-5.54,1.42)
  round 2 hole 1: 2(-2.77,1.42) 3(0,1.42) 4(2.77,1.42) 5(5.54,1.42) 6(-4.155,-1.42) 7(-1.385,-1.42) 8(1.385,-1.42) 9(4.155,-1.42)
  round 5 hole 3.05: MH1(-12.495,0) MH2(12.495,0)
  silkscreen extent -15.54,-15.37 15.65,3.02, body extent -15.48,-15.33 15.58,2.96, height 12.8
B6B-PH-K-S(LF)(SN) [mm]
  rect 1.8x1.8 hole 1: 1(-5,0)
  round 1.8 hole 1: 2(-3,0) 3(-1,0) 4(1,0) 5(3,0) 6(5,0)
  silkscreen extent -7.01,-2.84 7.01,1.75, body extent -6.95,-2.79 6.95,1.71, height 6
BZD27C5V1P_R1_00001 [mm]
  rect 0.91x1.22 smd: 1(-1.64,0) 2(1.64,0)
  silkscreen extent -2.31,-1.04 3.23,1.04, body extent -1.79,-0.83 1.79,0.82, height 0.95
Cap0402 [mil]
  rect 18x25 smd mask+2.36: 1(-18.5,0) 2(18.5,0)
  silkscreen extent -31,-16 31,16, body extent -20,-10 20,10, height 19
Cap0603 [mil]
  rect 30x35 smd mask+2.36: 1(-30,0) 2(30,0)
  silkscreen extent -49,-21 49,21, body extent -32,-16 31,16, height 34
Cap0805 [mil] "SMD 0805"
  rect 40x60 smd mask+2.76: 1(-40,0) 2(40,0)
  silkscreen extent -64,-34 64,34, body extent -39,-25 39,25, height 30
Cap1206 [mil] "SMD 1206"
  rect 60x70 smd: 1(-50,0) 2(50,0)
  silkscreen extent -84,-39 84,39, body extent -63,-31 63,32, height 39
"CAP 0201" [mm]
  rect 0.3x0.3 smd mask+0.055: 1(-0.3,0) 2(0.3,0)
  silkscreen extent -0.53,-0.23 0.53,0.23, body extent -0.3,-0.15 0.3,0.15, height 0.28
CAY10-473J4LF [mm] "RES ARRAY 4 RES 47K OHM 0804"
  rect 0.5x0.4 smd: 1(0,0) 4(0,-1.5) 5(1,-1.5) 8(1,0)
  rect 0.5x0.3 smd: 2(0,-0.5) 3(0,-1) 6(1,-1) 7(1,-0.5)
  silkscreen extent 0.08,-1.8 0.92,0.3, body extent 0,-1.74 1.02,0.27, height 0.36
CBC3225T330KR [mm] "1210 Inductors (SMD) ROHS"
  rect 0.85x2.7 smd: 1(-1.275,0) 2(1.275,0)
  silkscreen extent -1.78,-1.42 1.79,1.42, body extent -1.6,-1.25 1.6,1.25, height 2.7
ESD9B3.3ST5G-N [mm] "TVS DIODE Bidirectional 3.3V (Max) 3.8V 8V 10A SOD923"
  rect 0.4x0.7 smd: 1(-0.35,0) 2(0.35,0)
  silkscreen extent -0.66,-0.46 0.66,0.46, body extent -0.52,-0.32 0.53,0.33, height 0.43
F23BUUM13-W2 [mm] "Wifi+BLE module"
  rect 1.9x1 smd: 1(11.49,-9.28) 2(11.49,-6.48) 3(11.49,-2.98) 4(11.49,-0.5) 5(0,0) 6(0,-2) 7(0,-4.98) 8(0,-7.14)
  rect 1x1.5 smd: 9(2.7,-10.65) 10(3.97,-10.65) 11(5.24,-10.65) 12(6.51,-10.65) 13(7.78,-10.65) 14(9.05,-10.65)
  silkscreen extent -0.41,-10.92 12.32,2.55
FH12A-50S-0.5SH(55) [mm] "50 0.020\"(0.50mm) 0.079\"(2.00mm) Forward Slip Contact,Top SMD FFC, FPC Connectors ROHS"
  rect 0.3x1.3 smd: 1(-12.25,-2.087) 2(-11.75,-2.087) 3(-11.25,-2.087) 4(-10.75,-2.087) 5(-10.25,-2.087) 6(-9.75,-2.087) 7(-9.25,-2.087) 8(-8.75,-2.087) 9(-8.25,-2.087) 10(-7.75,-2.087) 11(-7.25,-2.087) 12(-6.75,-2.087) 13(-6.25,-2.087) 14(-5.75,-2.087) 15(-5.25,-2.087) 16(-4.75,-2.087) 17(-4.25,-2.087) 18(-3.75,-2.087) 19(-3.25,-2.087) 20(-2.75,-2.087) 21(-2.25,-2.087) 22(-1.75,-2.087) 23(-1.25,-2.087) 24(-0.75,-2.087) 25(-0.25,-2.087) 26(0.25,-2.087) 27(0.75,-2.087) 28(1.25,-2.087) 29(1.75,-2.087) 30(2.25,-2.087) 31(2.75,-2.087) 32(3.25,-2.087) 33(3.75,-2.087) 34(4.25,-2.087) 35(4.75,-2.087) 36(5.25,-2.087) 37(5.75,-2.087) 38(6.25,-2.087) 39(6.75,-2.087) 40(7.25,-2.087) 41(7.75,-2.087) 42(8.25,-2.087) 43(8.75,-2.087) 44(9.25,-2.087) 45(9.75,-2.087) 46(10.25,-2.087) 47(10.75,-2.087) 48(11.25,-2.087) 49(11.75,-2.087) 50(12.25,-2.087)
  rect 1.8x2.2 smd: 51(-14.15,2.088) 52(14.15,2.088)
  silkscreen extent -14.76,-3.07 14.78,5.13, body extent -14.75,-1.85 14.75,5.15, height 2.05
"IND 0402" [mm]
  rect 0.41x0.66 smd: 1(-0.505,0) 2(0.505,0)
  silkscreen extent -0.81,-0.43 0.81,0.43, body extent -0.5,-0.3 0.5,0.3, height 0.6
KMT021NGJLHS [mm] "Tactile Switches Ultra-LW Tact SW SMT SPNOFa 1.6N HF"
  rect 0.65x0.7 smd: 1(-1.475,0.95) 2(1.475,0.95) 3(1.475,-0.95) 4(-1.475,-0.95)
  silkscreen extent -1.81,-1.3 1.7,1.6, body extent -1.7,-1.3 1.7,1.3, height 0.63
"LED 0402" [mm] "LED BLUE CLEAR CHIP SMD"
  rect 0.5x0.7 smd: 1(-0.47,0) 2(0.47,0)
  silkscreen extent -0.84,-0.51 1.37,0.51, body extent -0.5,-0.25 0.5,0.25, height 0.5
LQH32PN1R0NNCL [mm]
  rect 1.25x2 smd: 1(-1.275,0) 2(1.275,0)
  silkscreen extent -1.55,-1.3 1.52,1.3, body extent -1.6,-1.25 1.6,1.25, height 1.7
LQH44PN470MJ0L [mm] "1515 Inductors (SMD) ROHS"
  rect 1.45x2.7 smd: 1(-1.475,0) 2(1.475,0)
  silkscreen extent -2.02,-2.01 1.98,2, body extent -2,-2 2,2, height 1.2
LT1942EUF#PBF [mm] "IC REG CONV TFT LCD 4OUT 24QFN"
  rect 0.7x0.25 smd: 1(-1.9,1.25) 2(-1.9,0.75) 3(-1.9,0.25) 4(-1.9,-0.25) 5(-1.9,-0.75) 6(-1.9,-1.25) 13(1.9,-1.25) 14(1.9,-0.75) 15(1.9,-0.25) 16(1.9,0.25) 17(1.9,0.75) 18(1.9,1.25)
  rect 0.25x0.7 smd: 7(-1.25,-1.9) 8(-0.75,-1.9) 9(-0.25,-1.9) 10(0.25,-1.9) 11(0.75,-1.9) 12(1.25,-1.9) 19(1.25,1.9) 20(0.75,1.9) 21(0.25,1.9) 22(-0.25,1.9) 23(-0.75,1.9) 24(-1.25,1.9)
  rect 2.45x2.45 smd: 25(0,0)
  silkscreen extent -2.32,-2.06 2.06,2.06, body extent -2.05,-2.05 2.05,2.05, height 0.8
NRS6045T220MMGK [mm] "FIXED IND 22UH 1.6A 139.1MOHM SM"
  rect 1.6x5.7 smd: 1(-2.35,0) 2(2.35,0)
  silkscreen extent -3.05,-3.12 3.05,3.12, body extent -3.1,-3.1 3.1,3.1, height 4.5
POM-2738P-R [mm]
  rect 1x1 hole 0.45: 1(-0.95,0)
  round 1 hole 0.45: 2(0.95,0)
  silkscreen extent -2.92,-3.73 2.92,2.11, body extent -3,-3.79 3,2.21, height 2.9
QFN-8 [mm]
  rect 0.7x0.25 smd: 1(-0.925,0.675) 2(-0.925,0.225) 3(-0.925,-0.225) 4(-0.925,-0.675) 5(0.925,-0.675) 6(0.925,-0.225) 7(0.925,0.225) 8(0.925,0.675)
  rect 0.64x1.37 smd: 9(0,0)
  silkscreen extent -1,-1 1,1
Res0603#1 [mil]
  rect 30x35 smd: 1(-30,0) 2(30,0)
  silkscreen extent -49,-21 49,21, body extent -31,-17 31,17, height 18
Res0603#2 [mil]
  rect 30x35 smd: 1(30,0) 2(-30,0)
  silkscreen extent -50,-25 50,25, body extent -31,-17 31,17, height 18
Res-0201 [mm]
  rect 0.27x0.37 smd: 1(-0.275,0) 2(0.275,0)
  silkscreen extent -0.48,-0.25 0.48,0.25, body extent -0.3,-0.15 0.3,0.15, height 0.29
S2B-XH-A(LF)(SN) [mm]
  rect 1.6x1.6 hole 0.9: 1(-1.25,0)
  round 1.6 hole 0.9: 2(1.25,0)
  silkscreen extent -3.78,-9.27 3.81,2.34, body extent -3.7,-9.21 3.7,2.29, height 6.15
S5P4418 [mm]
  rect 1.2x0.7 smd: 1(-25.856,24.75) 2(-25.5,23.65) 3(-25.5,22.55) 4(-25.5,21.45) 5(-25.5,20.35) 6(-25.5,19.25) 7(-25.5,18.15) 8(-25.5,17.05) 9(-25.5,15.95) 10(-25.5,14.85) 11(-25.5,13.75) 12(-25.5,12.65) 13(-25.5,11.55) 14(-25.5,10.45) 15(-25.5,9.35) 16(-25.5,8.25) 17(-25.5,7.15) 18(-25.5,6.05) 19(-25.5,4.95) 20(-25.5,3.85) 21(-25.5,2.75) 22(-25.5,1.65) 23(-25.5,0.55) 24(-25.5,-0.55) 25(-25.5,-1.65) 26(-25.5,-2.75) 27(-25.5,-3.85) 28(-25.5,-4.95) 29(-25.5,-6.05) 30(-25.5,-7.15) 31(-25.5,-8.25) 32(-25.5,-9.35) 33(-25.5,-10.45) 34(-25.5,-11.55) 35(-25.5,-12.65) 36(-25.5,-13.75) 37(-25.5,-14.85) 38(-25.5,-15.95) 39(-25.5,-17.05) 40(-25.5,-18.15) 41(-25.5,-19.25) 42(-25.5,-20.35) 43(-25.5,-21.45) 44(-25.5,-22.55) 45(-25.5,-23.65) 46(-25.856,-24.75) 93(25.856,-24.75) 94(25.5,-23.65) 95(25.5,-22.55) 96(25.5,-21.45) 97(25.5,-20.35) 98(25.5,-19.25) 99(25.5,-18.15) 100(25.5,-17.05) 101(25.5,-15.95) 102(25.5,-14.85) 103(25.5,-13.75) 104(25.5,-12.65) 105(25.5,-11.55) 106(25.5,-10.45) 107(25.5,-9.35) 108(25.5,-8.25) 109(25.5,-7.15) 110(25.5,-6.05) 111(25.5,-4.95) 112(25.5,-3.85) 113(25.5,-2.75) 114(25.5,-1.65) 115(25.5,-0.55) 116(25.5,0.55) 117(25.5,1.65) 118(25.5,2.75) 119(25.5,3.85) 120(25.5,4.95) 121(25.5,6.05) 122(25.5,7.15) 123(25.5,8.25) 124(25.5,9.35) 125(25.5,10.45) 126(25.5,11.55) 127(25.5,12.65) 128(25.5,13.75) 129(25.5,14.85) 130(25.5,15.95) 131(25.5,17.05) 132(25.5,18.15) 133(25.5,19.25) 134(25.5,20.35) 135(25.5,21.45) 136(25.5,22.55) 137(25.5,23.65) 138(25.856,24.75)
  rect 0.7x1.2 smd: 47(-24.75,-25.932) 48(-23.65,-25.5) 49(-22.55,-25.5) 50(-21.45,-25.5) 51(-20.35,-25.5) 52(-19.25,-25.5) 53(-18.15,-25.5) 54(-17.05,-25.5) 55(-15.95,-25.5) 56(-14.85,-25.5) 57(-13.75,-25.5) 58(-12.65,-25.5) 59(-11.55,-25.5) 60(-10.45,-25.5) 61(-9.35,-25.5) 62(-8.25,-25.5) 63(-7.15,-25.5) 64(-6.05,-25.5) 65(-4.95,-25.5) 66(-3.85,-25.5) 67(-2.75,-25.5) 68(-1.65,-25.5) 69(-0.55,-25.5) 70(0.55,-25.5) 71(1.65,-25.5) 72(2.75,-25.5) 73(3.85,-25.5) 74(4.95,-25.5) 75(6.05,-25.5) 76(7.15,-25.5) 77(8.25,-25.5) 78(9.35,-25.5) 79(10.45,-25.5) 80(11.55,-25.5) 81(12.65,-25.5) 82(13.75,-25.5) 83(14.85,-25.5) 84(15.95,-25.5) 85(17.05,-25.5) 86(18.15,-25.5) 87(19.25,-25.5) 88(20.35,-25.5) 89(21.45,-25.5) 90(22.55,-25.5) 91(23.65,-25.5) 92(24.75,-25.932) 139(24.75,25.932) 140(23.65,25.5) 141(22.55,25.5) 142(21.45,25.5) 143(20.35,25.5) 144(19.25,25.5) 145(18.15,25.5) 146(17.05,25.5) 147(15.95,25.5) 148(14.85,25.5) 149(13.75,25.5) 150(12.65,25.5) 151(11.55,25.5) 152(10.45,25.5) 153(9.35,25.5) 154(8.25,25.5) 155(7.15,25.5) 156(6.05,25.5) 157(4.95,25.5) 158(3.85,25.5) 159(2.75,25.5) 160(1.65,25.5) 161(0.55,25.5) 162(-0.55,25.5) 163(-1.65,25.5) 164(-2.75,25.5) 165(-3.85,25.5) 166(-4.95,25.5) 167(-6.05,25.5) 168(-7.15,25.5) 169(-8.25,25.5) 170(-9.35,25.5) 171(-10.45,25.5) 172(-11.55,25.5) 173(-12.65,25.5) 174(-13.75,25.5) 175(-14.85,25.5) 176(-15.95,25.5) 177(-17.05,25.5) 178(-18.15,25.5) 179(-19.25,25.5) 180(-20.35,25.5) 181(-21.45,25.5) 182(-22.55,25.5) 183(-23.65,25.5) 184(-24.75,25.932)
  silkscreen extent -26.92,24.61 -26.67,24.87, body extent -26.4,-26.4 26.4,26.4, height 2.54
SI2301BDS-T1-E3 [mm] "SOT-23-3(TO-236) MOSFETs ROHS"
  rect 0.559x0.724 smd: 1(-0.95,-0.984) 2(0.95,-0.984) 3(0,0.985)
  silkscreen extent -1.47,-1.27 1.44,0.62, body extent -1.5,-1.25 1.5,1.25, height 1.05
SJ-43515TS-SMT-TR [mm]
  rect 2x2.3 smd: 1(-8.1,-3.7)
  rect 2.8x2.3 smd: 2(4.1,-3.6)
  rect 2.2x2.3 smd: 3(-3.4,3.7) 4(-5.3,-3.7)
  rect 2.6x2.8 smd: 5(8.1,0.75)
  round 1.7 hole 1.7 unplated: ""(-4.2,0) ""(2.8,0)
  silkscreen extent -10.28,-3.95 6.8,3.21, body extent -10.44,-4.55 8.76,4.45, height 5.3
SMC [mm]
  rect 1.52x3.2 smd: 1(-3.105,0) 2(3.105,0)
  silkscreen extent -5.54,-3 3.45,3, body extent -3.9,-2.95 3.9,2.95, height 2.42
"SMD PAD" [mil] "SMD 0805"
  rect 40x60 smd: 1(-40,0) 2(40,0)
  silkscreen extent -65,-35 65,35
SOD-123 [mm]
  rect 0.92x0.97 smd: 1(-1.575,0) 2(1.575,0)
  silkscreen extent -1.47,-0.92 3.17,0.91, body extent -1.85,-0.8 1.85,0.8, height 1.27
"Solder Bridge" [mil] "Solder Bridge ON"
  rect 30x35 smd: 1(-30,0) 2(30,0)
  silkscreen extent -50,-22 50,22
SOT23-3 [mm] "SOT23, 3-Leads, Body 2.9x1.3mm, Pitch 0.95mm, Lead Span 2.3mm - Reverse Pinning, IPC High Density"
  rect 0.8x0.8 smd: 1(-0.95,-1.075) 2(0.95,-1.075) 3(0,1.075)
  silkscreen extent -1.83,-1.39 1.63,0.81, body extent -1.5,-1.25 1.5,1.25, height 1.05
SOT23-5 [mil] "SOT23-5 Package"
  rect 40x27 smd: 1(-49.21,39.37) 2(-49.21,0) 3(-49.21,-39.37) 4(49.21,-39.37) 5(49.21,39.37)
  silkscreen extent -58,-61 36,68, body extent -46,-58 53,60, height 43
SOT-23 [mm] "TRANS NPN 40V 0.6A SOT23"
  rect 0.82x0.92 smd: 1(-0.95,-1) 2(0.95,-1) 3(0,1)
  silkscreen extent -1.82,-1.23 1.6,0.76, body extent -1.5,-1.25 1.5,1.25, height 1.05
SOT-23-6 [mm] "IC BAT CHG LI-ION 1 CELL SOT23-6"
  rect 1.12x0.62 smd: 1(-1.3,0.95) 2(-1.3,0) 3(-1.3,-0.95) 4(1.3,-0.95) 5(1.3,0) 6(1.3,0.95)
  silkscreen extent -1.68,-1.5 0.86,1.57, body extent -1.4,-1.45 1.4,1.45, height 1.44
SSOP-28 [mm]
  rect 1.25x0.42 smd: 1(-3.275,4.225) 2(-3.275,3.575) 3(-3.275,2.925) 4(-3.275,2.275) 5(-3.275,1.625) 6(-3.275,0.975) 7(-3.275,0.325) 8(-3.275,-0.325) 9(-3.275,-0.975) 10(-3.275,-1.625) 11(-3.275,-2.275) 12(-3.275,-2.925) 13(-3.275,-3.575) 14(-3.275,-4.225) 15(3.275,-4.225) 16(3.275,-3.575) 17(3.275,-2.925) 18(3.275,-2.275) 19(3.275,-1.625) 20(3.275,-0.975) 21(3.275,-0.325) 22(3.275,0.325) 23(3.275,0.975) 24(3.275,1.625) 25(3.275,2.275) 26(3.275,2.925) 27(3.275,3.575) 28(3.275,4.225)
  silkscreen extent -3.84,-5.03 3.05,5.03
ST4SI2M0020TPIFW [mil] "GSMA ESIM SYSTEM-ON-CHIP FOR SEC"
  rect 36x16 smd: 1(-113,75) 2(-113,25) 3(-113,-25) 4(-113,-75) 5(111,-75) 6(111,-25) 7(111,25) 8(111,75)
  rect 138x169 smd: 9(0,0)
  silkscreen extent -134,-97 117,97, body extent -118,-98 118,99, height 39
T491C226K025AT [mm]
  rect 2.5x2.7 smd: 1(-2.87,0) 2(2.87,0)
  silkscreen extent -3.78,-1.8 2.67,2.41, body extent -3.15,-1.75 3.15,1.75, height 2.8
"TEST POINT" [mil]
  oct 60x60 smd: 1(0,0)
  silkscreen extent -37,-37 37,37
TF31-22S-0.5SH(800) [mm] "CONN FFC 22POS 0.50MM SMD"
  rect 0.3x1.3 smd: 1(-5.25,-1.625) 2(-4.75,-1.625) 3(-4.25,-1.625) 4(-3.75,-1.625) 5(-3.25,-1.625) 6(-2.75,-1.625) 7(-2.25,-1.625) 8(-1.75,-1.625) 9(-1.25,-1.625) 10(-0.75,-1.625) 11(-0.25,-1.625) 12(0.25,-1.625) 13(0.75,-1.625) 14(1.25,-1.625) 15(1.75,-1.625) 16(2.25,-1.625) 17(2.75,-1.625) 18(3.25,-1.625) 19(3.75,-1.625) 20(4.25,-1.625) 21(4.75,-1.625) 22(5.25,-1.625)
  rect 1.9x2.2 smd: MP1(7.2,1.625) MP2(-7.2,1.625)
  silkscreen extent -7.7,-2.01 7.67,3.78, body extent -7.65,-1.97 7.65,3.78, height 1.97
TSOT-23-6 [mm]
  rect 1.2x0.6 smd: 1(-1.3,0.95) 2(-1.3,0) 3(-1.3,-0.95) 3(-1.3,-0.95) 4(1.3,-0.95) 5(1.3,0) 6(1.3,0.95)
  silkscreen extent -1.73,-1.55 0.58,1.63, body extent -1.4,-1.5 1.4,1.5, height 0.86
U.FL-R-SMT-1(80) [mm]
  rect 1.02x1.07 smd: 1(0,-0.923)
  rect 1.07x2.2 smd: 2(1.475,1.025) 3(-1.475,1.025)
  silkscreen extent -1.57,-0.79 1.57,2.51, body extent -1.47,-0.69 1.53,2.41, height 1.2
UC200T [mm]
  rect 2.5x0.8 smd: 1(-15.75,12.6) 2(-15.75,11.3) 3(-15.75,10) 4(-15.75,8.7) 5(-15.75,7.4) 6(-15.75,6.1) 7(-15.75,4.8) 8(-15.75,0.4) 9(-15.75,-0.9) 10(-15.75,-2.2) 11(-15.75,-3.5) 12(-15.75,-4.8) 13(-15.75,-6.1) 14(-15.75,-7.4) 15(-15.75,-8.7) 16(-15.75,-10) 17(-15.75,-11.3) 18(-15.75,-12.6) 37(15.75,-12.6) 38(15.75,-11.3) 39(15.75,-10) 40(15.75,-8.7) 41(15.75,-7.4) 42(15.75,-6.1) 43(15.75,-4.8) 44(15.75,-3.5) 45(15.75,-2.2) 46(15.75,-0.9) 47(15.75,0.4) 48(15.75,4.8) 49(15.75,6.1) 50(15.75,7.4) 51(15.75,8.7) 52(15.75,10) 53(15.75,11.3) 54(15.75,12.6) 141(-15.75,3) 142(-15.75,1.7) 143(15.75,1.7) 144(15.75,3)
  rect 0.8x2.5 smd: 19(-9.55,-14.25) 20(-8.25,-14.25) 21(-6.95,-14.25) 22(-5.65,-14.25) 23(-4.35,-14.25) 24(-3.05,-14.25) 25(-1.75,-14.25) 26(-0.45,-14.25) 27(0.85,-14.25) 28(2.15,-14.25) 29(3.45,-14.25) 30(4.75,-14.25) 31(6.05,-14.25) 32(7.35,-14.25) 33(8.65,-14.25) 34(9.95,-14.25) 35(11.25,-14.25) 36(12.55,-14.25) 55(12.55,14.25) 56(11.25,14.25) 57(9.95,14.25) 58(8.65,14.25) 59(7.35,14.25) 60(6.05,14.25) 61(4.75,14.25) 62(3.45,14.25) 63(2.15,14.25) 64(0.85,14.25) 65(-0.45,14.25) 66(-1.75,14.25) 67(-3.05,14.25) 68(-4.35,14.25) 69(-5.65,14.25) 70(-6.95,14.25) 71(-8.25,14.25) 72(-9.55,14.25) 113(-10.85,14.25) 114(-12.15,14.25) 115(-10.85,-14.25) 116(-12.15,-14.25)
  rect 2x3.3 smd: 85(8.2,9.6) 86(8.2,4.8) 87(8.2,0) 88(8.2,-4.8) 89(8.2,-9.6) 90(5,9.6) 91(5,4.8) 92(5,0) 93(5,-4.8) 94(5,-9.6) 95(1.6,9.6) 96(1.6,4.8) 97(1.6,-4.8) 98(1.6,-9.6) 99(-1.6,9.6) 100(-1.6,4.8) 101(-1.6,-4.8) 102(-1.6,-9.6) 103(-5,9.6) 104(-5,4.8) 105(-5,0) 106(-5,-4.8) 107(-5,-9.6) 108(-8.2,9.6) 109(-8.2,4.8) 110(-8.2,0) 111(-8.2,-4.8) 112(-8.2,-9.6)
  silkscreen extent -17.98,-14.5 16.01,14.53, body extent -16,-14.5 16,14.5, height 2.4

## Part data
C1 C7 C11 C12: library part C1608X5R1E475M080AC, "CAP CER 4.7UF 25V X5R 0603", Case/Package=0603, Case Code (Metric)=1608, Dielectric=X5R, Dielectric Material=Ceramic, Manufacturer=TDK, Max Operating Temperature=85°C, Min Operating Temperature=-55°C, Package Quantity=1, Supplier Part Number 1=810-C1608X5R1E475M, Tolerance=20%, Voltage Rating=25V, Capacitance=4.7uF, Case Code (Imperial)=0603, ComponentLink1Description=http://www.yageo.com/NewPortal/_en/search/productDocs.jsp?YageoPartNumber=AC0603JRNPO0BN470&src-supplier=Digi-Key, ComponentLink1URL=http://www.yageo.com/NewPortal/_en/search/productDocs.jsp?YageoPartNumber=AC0603JRNPO0BN470&src-supplier=Digi-Key, ComponentLink2Description=https://www.verical.com/server-webapp/html/getDatasheet?partID=726745&src-supplier=Verical, ComponentLink2URL=https://www.verical.com/server-webapp/html/getDatasheet?partID=726745&src-supplier=Verical, Composition=Ceramic, Depth=0.8mm, Height=0.8mm, Lead Free="Lead Free", Length=1.6mm, Manufacturer Part Number=C1608X5R1E475M080AC, Mount="Surface Mount", Packaging="Tape and Reel", Pricing 1="1=0.29, 10=0.237, 100=0.142, 500=0.106, 1000=0.09, 4000=0.076, 8000=0.072, 24000=0.07, 48000=0.067 (USD)", Radiation Hardening=No, REACH SVHC="No SVHC", Stock 1=40236, Supplier 1=Mouser, Termination=SMD/SMT, Thickness=0.039inch, Voltage Rating (DC)=25V, Weight=7.1E-05oz, Width=0.031inch
C2 C16 C29 C31 C33 C34 C43 C44 C45: library part CC0603KRX5R8BB105, "CAP CER 1UF 25V X5R 0603", Case/Package=0603, Case Code (Metric)=1608, Dielectric=X5R, Manufacturer=Yageo, Max Operating Temperature=85°C, Min Operating Temperature=-55°C, Package Quantity=1, Supplier Part Number 1=311-1445-1-ND, Tolerance=10%, Voltage Rating=25V, Capacitance=1uF, Case Code (Imperial)=0603, ComponentLink1Description=http://www.yageo.com/documents/recent/UPY-GPHC_X5R_4V-to-50V_25.pdf?src-supplier=Digi-Key, ComponentLink1URL=http://www.yageo.com/documents/recent/UPY-GPHC_X5R_4V-to-50V_25.pdf?src-supplier=Digi-Key, ComponentLink2Description=http://www.yageo.com/documents/recent/UPY-GPHC_X5R_4V-to-50V_12.pdf?src-supplier=Avnet+Europe, ComponentLink2URL=http://www.yageo.com/documents/recent/UPY-GPHC_X5R_4V-to-50V_12.pdf?src-supplier=Avnet+Europe, ComponentLink3Description=http://www.farnell.com/datasheets/1525783.pdf?src-supplier=Element14, ComponentLink3URL=http://www.farnell.com/datasheets/1525783.pdf?src-supplier=Element14, ComponentLink4Description=http://www.yageo.com/documents/recent/UPY-GPHC_X5R_4V-to-50V_12.pdf?src-supplier=Avnet, ComponentLink4URL=http://www.yageo.com/documents/recent/UPY-GPHC_X5R_4V-to-50V_12.pdf?src-supplier=Avnet, Depth=0.8mm, Halogen Free="Halogen Free", Height=0.8mm, Lead Free="Lead Free", Length=1.6mm, Manufacturer Part Number=CC0603KRX5R8BB105, Mount="Surface Mount", Number of Pins=2, Packaging="Tape and Reel", Pricing 1="1=0.1, 10=0.076, 100=0.0337, 500=0.0241, 1000=0.01894 (USD)", Radiation Hardening=No, REACH SVHC="No SVHC", Stock 1=459947, Supplier 1=Digi-Key, Termination=SMD/SMT, Thickness=0.035inch, Voltage Rating (DC)=25V, Width=0.031inch
C3 C5 C8 C9 C10 C13 C14 C18 C24 C36 C37 C38 C39 C40 C41 C42 C46 C49 C52 C54 C58 C60 C63 C64 C66 C76 C78 C79 C80 C81 C85 C88 C91: library part CC0603ZRY5V9BB104, "CAP CER 0.1UF 50V Y5V 0603", Capacitance=100nF, Case Code (Imperial)=0603, Case Code (Metric)=1608, Dielectric=Y5V, Manufacturer=Yageo, Max Operating Temperature=85°C, Min Operating Temperature=-30°C, Package Quantity=1, Supplier Part Number 1=311-1343-1-ND, Tolerance=80%, Voltage=50V, Case/Package=0603, ComponentLink1Description=http://www.yageo.com/documents/recent/UPY-GPHC_Y5V_6.3V-to-50V_8.pdf?src-supplier=Digi-Key, ComponentLink1URL=http://www.yageo.com/documents/recent/UPY-GPHC_Y5V_6.3V-to-50V_8.pdf?src-supplier=Digi-Key, ComponentLink2Description=http://www.yageo.com/documents/recent/UPY-GPHC_Y5V_6.3V-to-50V_5.pdf?src-supplier=Avnet+Europe, ComponentLink2URL=http://www.yageo.com/documents/recent/UPY-GPHC_Y5V_6.3V-to-50V_5.pdf?src-supplier=Avnet+Europe, ComponentLink3Description=https://www.verical.com/server-webapp/html/getDatasheet?partID=403611&src-supplier=Verical, ComponentLink3URL=https://www.verical.com/server-webapp/html/getDatasheet?partID=403611&src-supplier=Verical, ComponentLink4Description=http://www.mouser.com/ds/2/447/Yageo_UPY-GP_NP0_16V-to-50V_9-358835.pdf?src-supplier=Mouser, ComponentLink4URL=http://www.mouser.com/ds/2/447/Yageo_UPY-GP_NP0_16V-to-50V_9-358835.pdf?src-supplier=Mouser, ComponentLink5Description=http://www.farnell.com/datasheets/1132289.pdf?src-supplier=Element14, ComponentLink5URL=http://www.farnell.com/datasheets/1132289.pdf?src-supplier=Element14, Composition=Ceramic, Depth=0.8mm, Halogen Free="Halogen Free", Height=0.8mm, Lead Free="Lead Free", Length=1.6mm, Manufacturer Part Number=CC0603ZRY5V9BB104, Mount="Surface Mount", Number of Pins=2, Packaging="Tape and Reel", Pricing 1="1=0.1, 10=0.075, 100=0.0334, 500=0.02386, 1000=0.01874 (USD)", Radiation Hardening=No, REACH SVHC="No SVHC", Stock 1=15000880, Supplier 1=Digi-Key, Termination=SMD/SMT, Thickness=0.035inch, Voltage Rating=50V, Voltage Rating (DC)=50V, Width=0.031inch
C4 C6 C17 C30 C32 C35 C53 C57 C59 C61 C62 C89: library part GRM188R6YA106MA73D, "CAP CER 10UF 35V X5R 0603", Case/Package=0603, Case Code (Metric)=1608, Dielectric=X5R, Manufacturer=Murata, Max Operating Temperature=85°C, Min Operating Temperature=-55°C, Supplier Part Number 1=490-13248-6-ND, Tolerance=20%, Voltage Rating=35V, Capacitance=10uF, Case Code (Imperial)=0603, ComponentLink1Description=http://search.murata.co.jp/Ceramy/image/img/A01X/G101/ENG/GRM188R6YA106MA73-01.pdf?src-supplier=Digi-Key, ComponentLink1URL=http://search.murata.co.jp/Ceramy/image/img/A01X/G101/ENG/GRM188R6YA106MA73-01.pdf?src-supplier=Digi-Key, ComponentLink2Description=http://search.murata.co.jp/Ceramy/image/img/A01X/G101/ENG/GRM188R6YA106MA73-01.pdf?src-supplier=Mouser, ComponentLink2URL=http://search.murata.co.jp/Ceramy/image/img/A01X/G101/ENG/GRM188R6YA106MA73-01.pdf?src-supplier=Mouser, ComponentLink3Description=https://www.murata.com/~/media/webrenewal/support/library/catalog/products/capacitor/mlcc/c02e.ashx?la=en-us&src-supplier=Digi-Key, ComponentLink3URL=https://www.murata.com/~/media/webrenewal/support/library/catalog/products/capacitor/mlcc/c02e.ashx?la=en-us&src-supplier=Digi-Key, ComponentLink4Description=http://search.murata.co.jp/Ceramy/image/img/A01X/G101/ENG/GRM188R6YA106MA73-01.pdf?src-supplier=Future+Electronics, ComponentLink4URL=http://search.murata.co.jp/Ceramy/image/img/A01X/G101/ENG/GRM188R6YA106MA73-01.pdf?src-supplier=Future+Electronics, ComponentLink5Description=http://search.murata.co.jp/Ceramy/image/img/A01X/G101/ENG/GRM188R6YA106MA73-01.pdf?src-supplier=TTI, ComponentLink5URL=http://search.murata.co.jp/Ceramy/image/img/A01X/G101/ENG/GRM188R6YA106MA73-01.pdf?src-supplier=TTI, Length=0.063inch, Manufacturer Part Number=GRM188R6YA106MA73D, Mount="Surface Mount", Packaging="Tape and Reel", Pricing 1="1=0.5, 10=0.346, 100=0.2076, 500=0.1557, 1000=0.13148 (USD)", Stock 1=11640, Supplier 1=Digi-Key, Thickness=0.039inch, Voltage Rating (DC)=35V, Width=0.031inch
C15 CF1: library part GRM155R71H103KA88J, "CAP CER 10000PF 50V X7R 0402", Case Code (Imperial)=0402, Case Code (Metric)=1005, Dielectric=X7R, Manufacturer=Murata, Max Operating Temperature=125°C, Min Operating Temperature=-55°C, Package Quantity=50000, Supplier Part Number 1=490-6351-1-ND, Tolerance=10%, Voltage=50V, Capacitance=10nF, Case/Package=0402, ComponentLink1Description=https://www.murata.com/~/media/webrenewal/support/library/catalog/products/capacitor/mlcc/c02e.ashx?la=en-us&src-supplier=Digi-Key, ComponentLink1URL=https://www.murata.com/~/media/webrenewal/support/library/catalog/products/capacitor/mlcc/c02e.ashx?la=en-us&src-supplier=Digi-Key, Depth=0.5mm, Height=0.5mm, Lead Free="Lead Free", Length=1mm, Manufacturer Part Number=GRM155R71H103KA88J, Mount="Surface Mount", Packaging="Tape and Reel", Pricing 1="1=0.1, 10=0.042, 100=0.0186, 500=0.01328, 1000=0.01044, 2500=0.00949, 5000=0.00873 (USD)", Radiation Hardening=No, Stock 1=2794495, Supplier 1=Digi-Key, Termination=SMD/SMT, Thickness=0.022inch, Voltage Rating=50V, Voltage Rating (DC)=50V, Width=0.02inch
C19 C20: library part CC0603BRNPO9BN1R2, "CAP 1.2pF 50V, 0603", Case/Package=0603, Case Code (Metric)=1608, Dielectric=C0G, Manufacturer=Yageo, Max Operating Temperature=125°C, Min Operating Temperature=-55°C, Package Quantity=4000, Resistor Type=Ceramic, Supplier Part Number 1=603-CC603BRNPO9BN1R2, Voltage Rating=50V, Capacitance=1.2pF, Case Code (Imperial)=0603, Category="Ceramic Capacitors", ComponentLink1Description=https://datasheet.ciiva.com/26862/getdatasheetpartid-403487-26862671.pdf?src-supplier=Verical, ComponentLink1URL=https://datasheet.ciiva.com/26862/getdatasheetpartid-403487-26862671.pdf?src-supplier=Verical, ComponentLink2Description=https://datasheet.ciiva.com/13210/upy-gp-np0-16v-to-50v-8-13210853.pdf?src-supplier=Mouser, ComponentLink2URL=https://datasheet.ciiva.com/13210/upy-gp-np0-16v-to-50v-8-13210853.pdf?src-supplier=Mouser, ComponentLink3Description=https://datasheet.ciiva.com/11586/upy-gp-np0-16v-to-50v-8-11586536.pdf?src-supplier=Avnet, ComponentLink3URL=https://datasheet.ciiva.com/11586/upy-gp-np0-16v-to-50v-8-11586536.pdf?src-supplier=Avnet, ComponentLink4Description=https://datasheet.ciiva.com/17437/upy-gp-np0-16v-to-50v-8-17437548.pdf?src-supplier=Avnet+Europe, ComponentLink4URL=https://datasheet.ciiva.com/17437/upy-gp-np0-16v-to-50v-8-17437548.pdf?src-supplier=Avnet+Europe, Depth=0.8mm, Lead Free="Lead Free", Length=1.6mm, Manufacturer Part Number=CC0603BRNPO9BN1R2, Mount="Surface Mount", Packaging="Tape and Reel", Pricing 1="1=0.14000, 10=0.08500, 50=0.08500, 100=0.03800, 1000=0.02100, 10000=0.01500 (USD)", Radiation Hardening=No, RoHS=Yes, RoHS Compliant=Yes, Series=CC, Stock 1=8000, Supplier 1=Mouser, Termination=SMD/SMT, Thickness=0.035inch, Voltage Rating (DC)=50V, Width=0.031inch